# Altium PCB PCB1.PcbDoc (part 1 of 3)
Units mm, origin at the board's own origin, x right, y up, seen from the top; angles counter-clockwise.
Board outline 131 x 74 mm, 6 copper layers (Top Layer, Rele, Signals, +5V, GND, Bottom Layer), stack 1.732 mm thick; 176 components, 158 nets, 639 pads, 196 vias.
Unrouted connection lines stored in the file: 8.
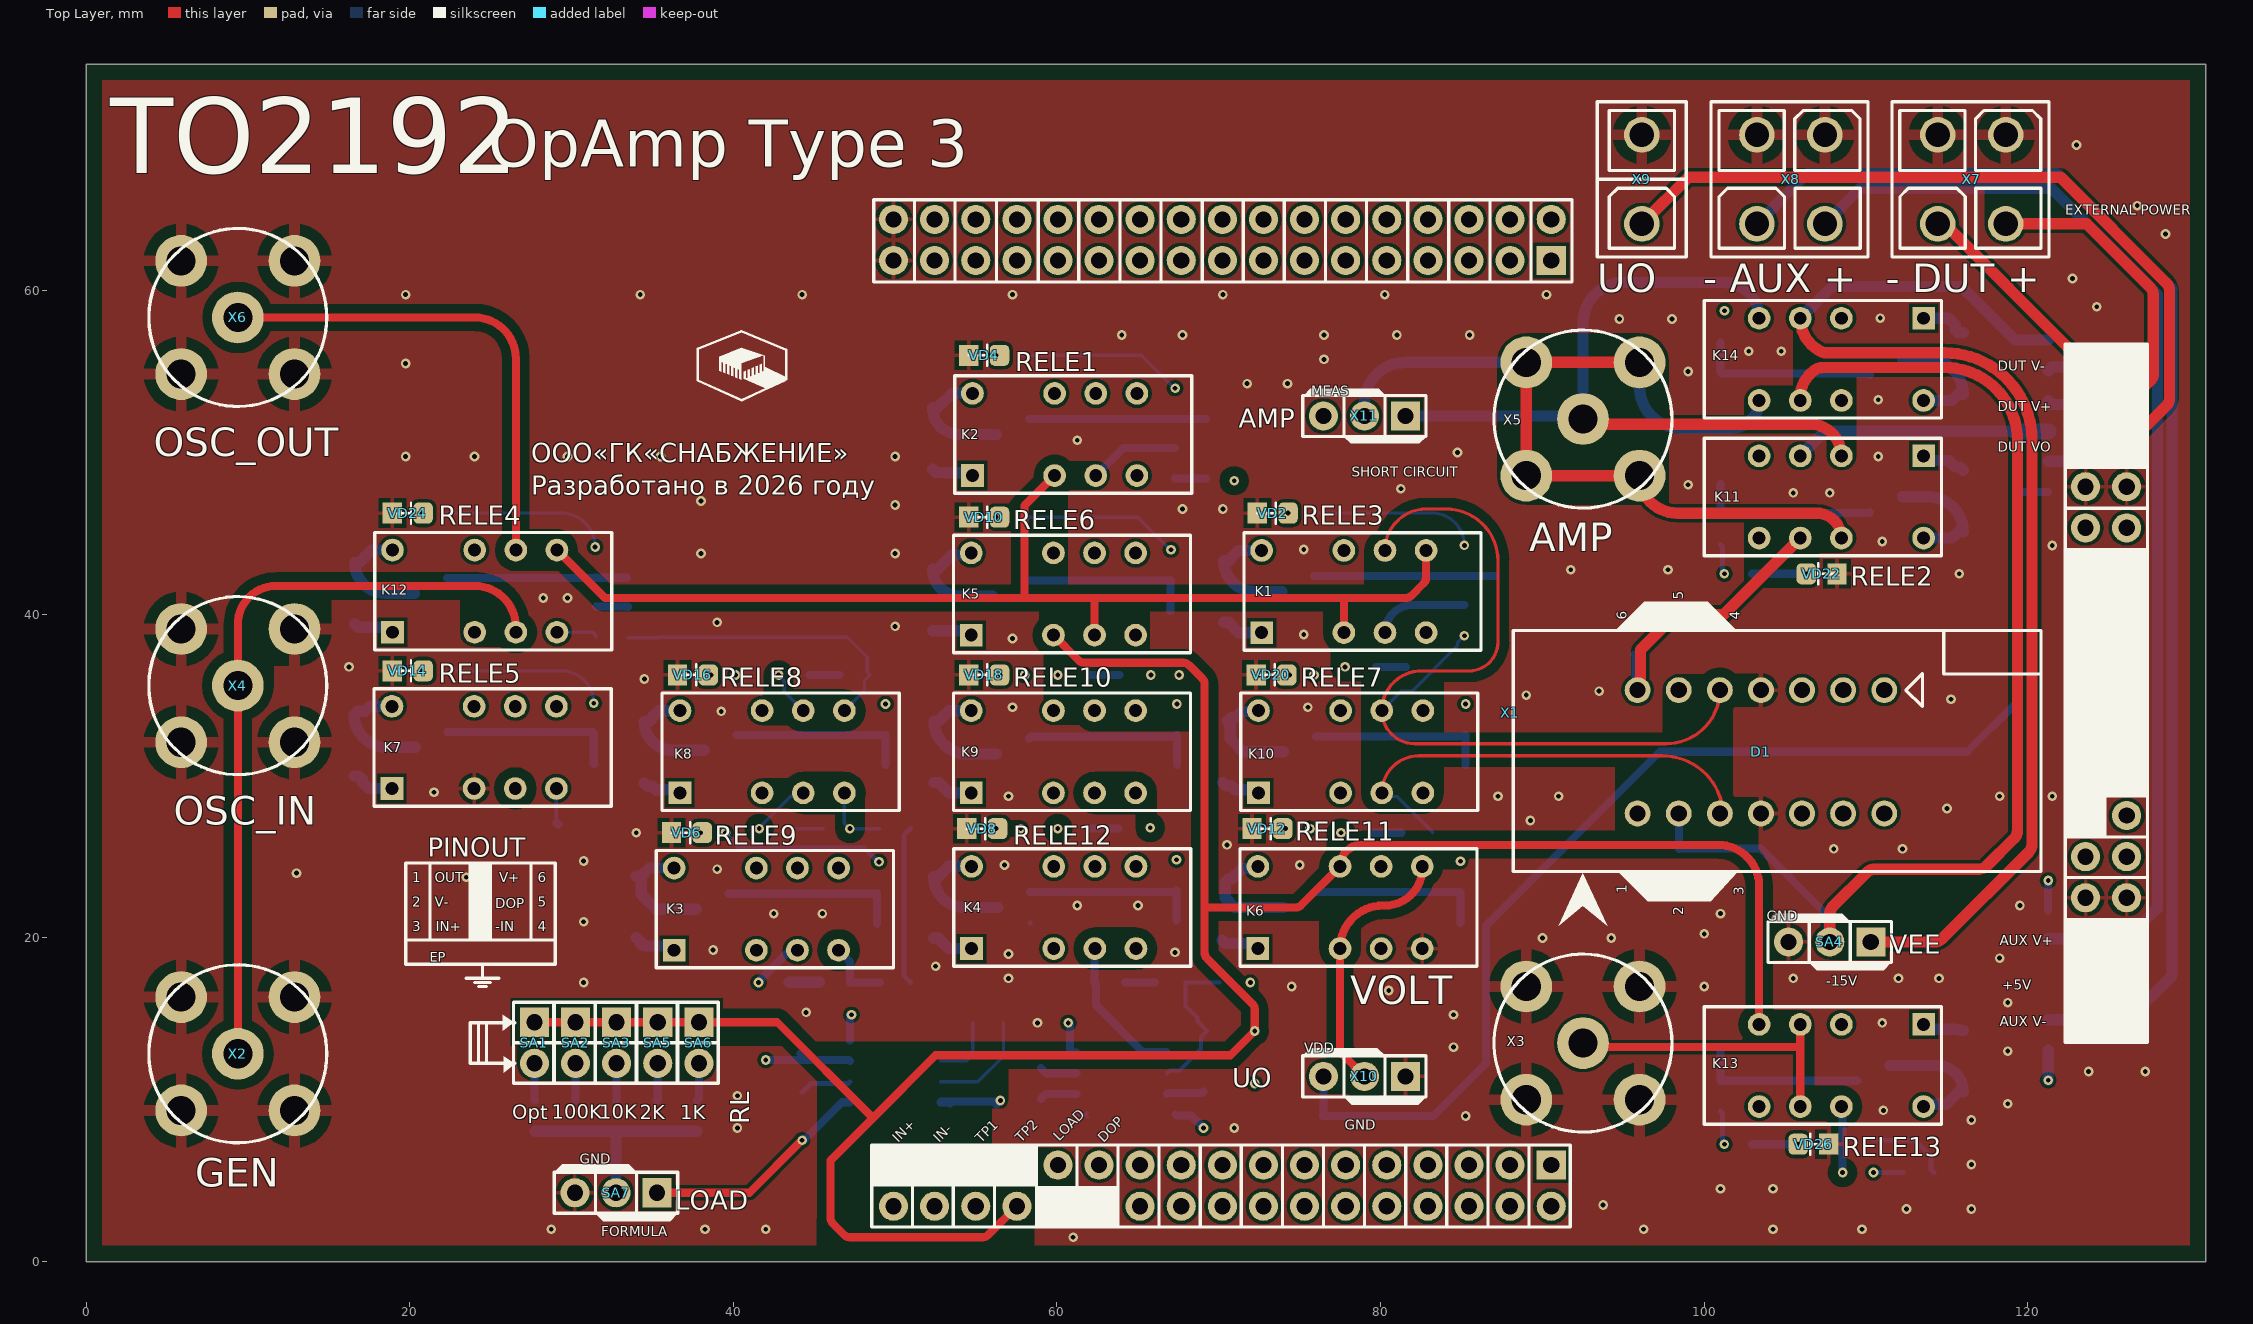
[diagram p0: Top Layer view]
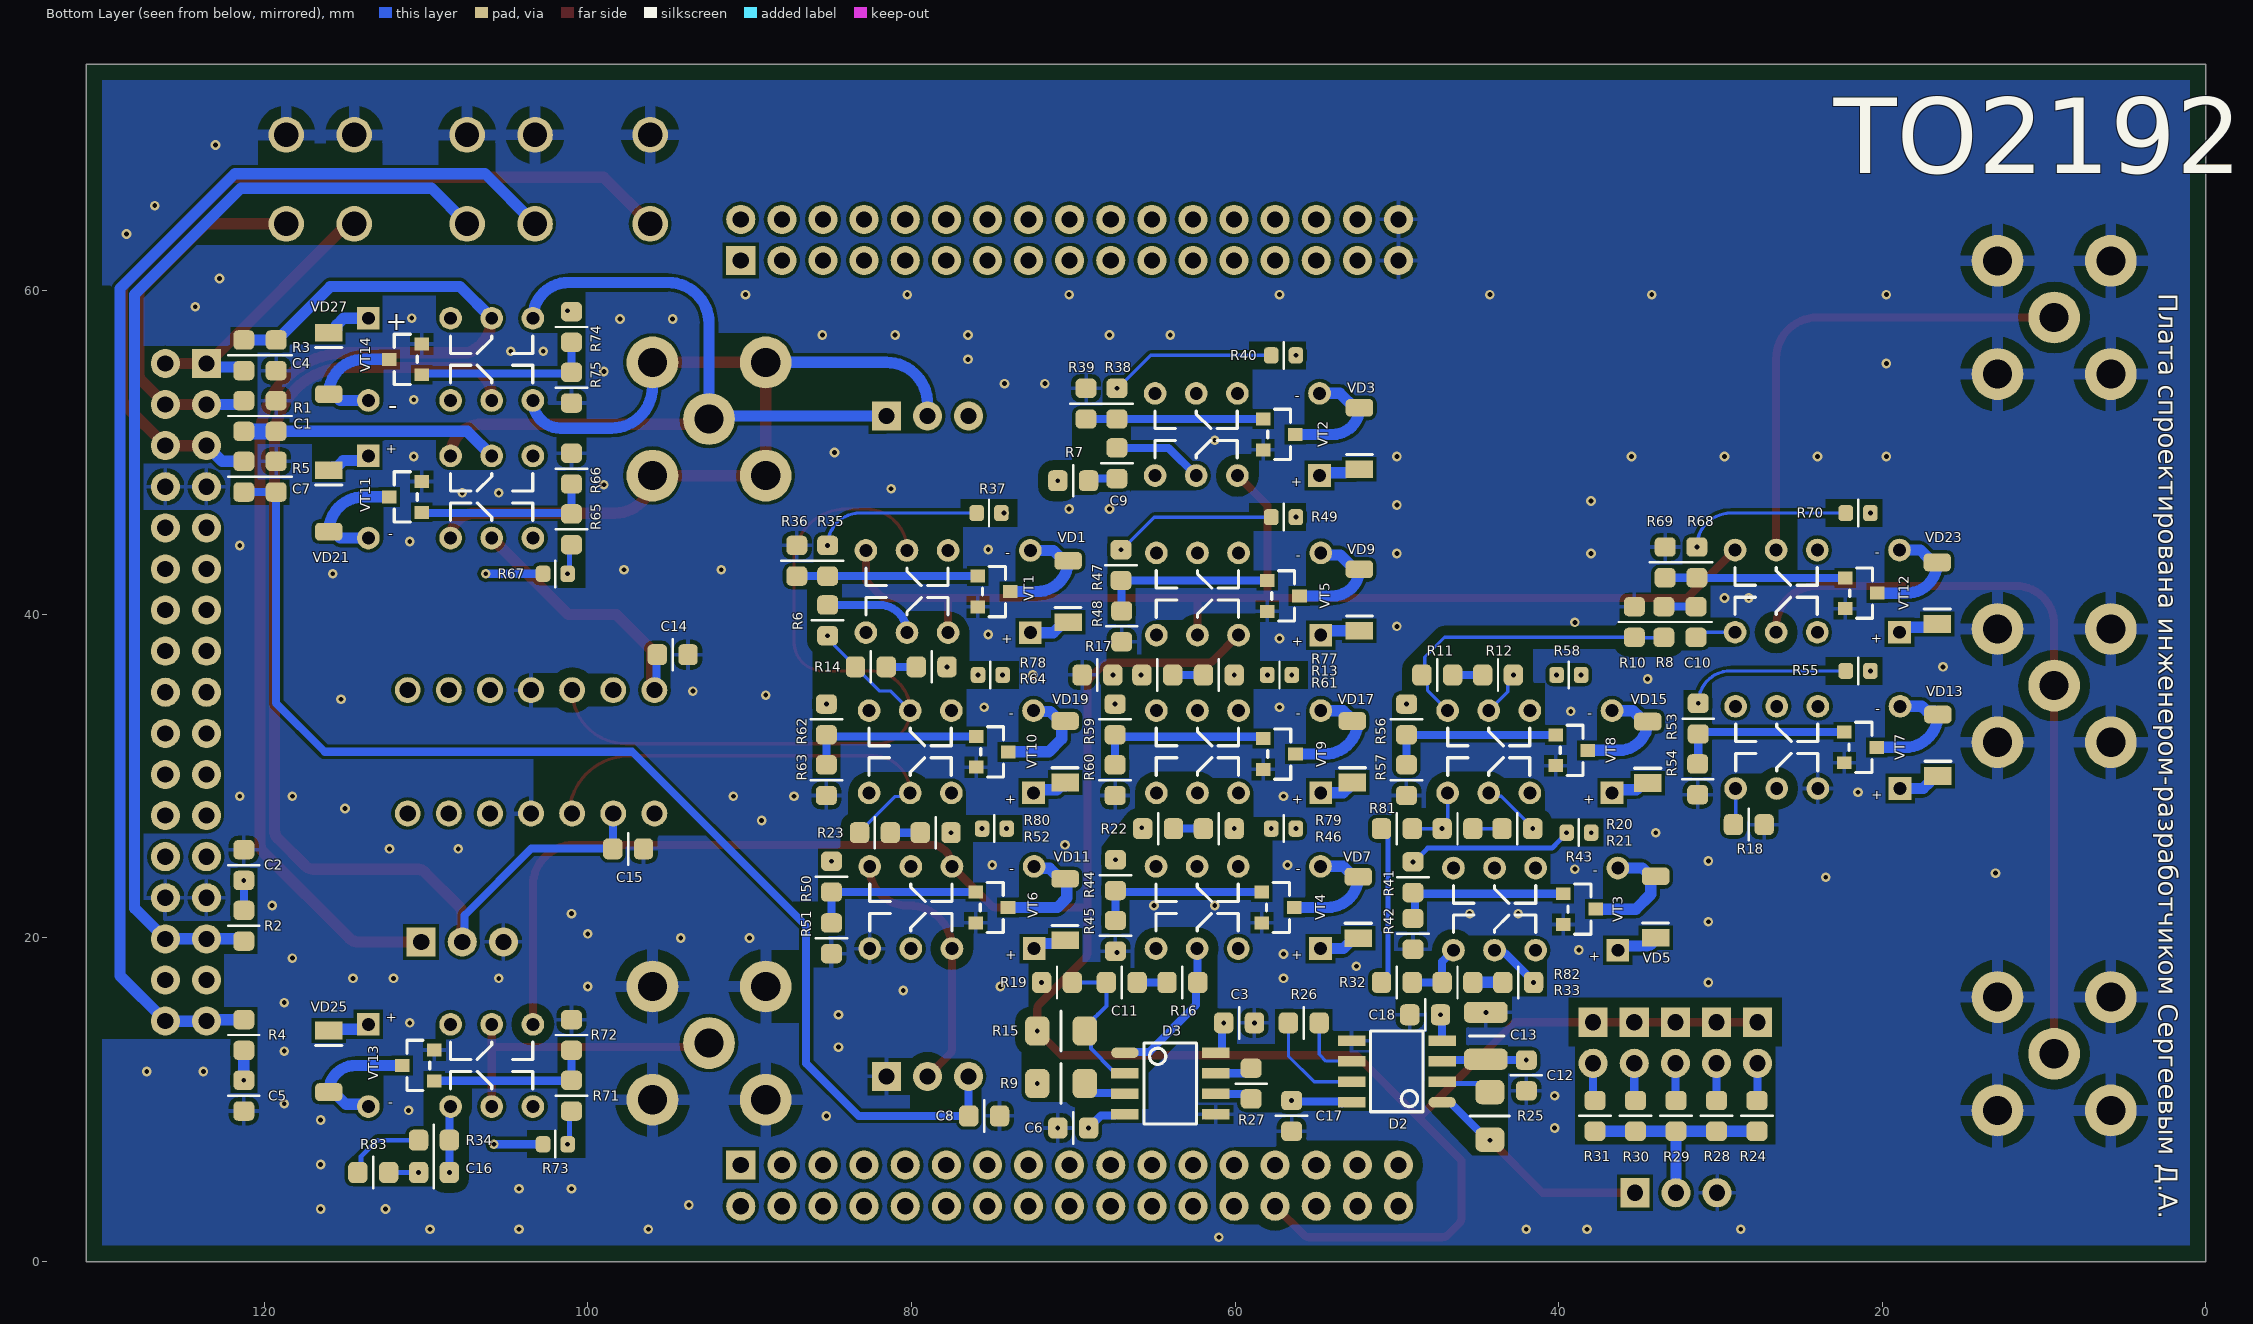
[diagram p1: Bottom Layer view, seen from below]
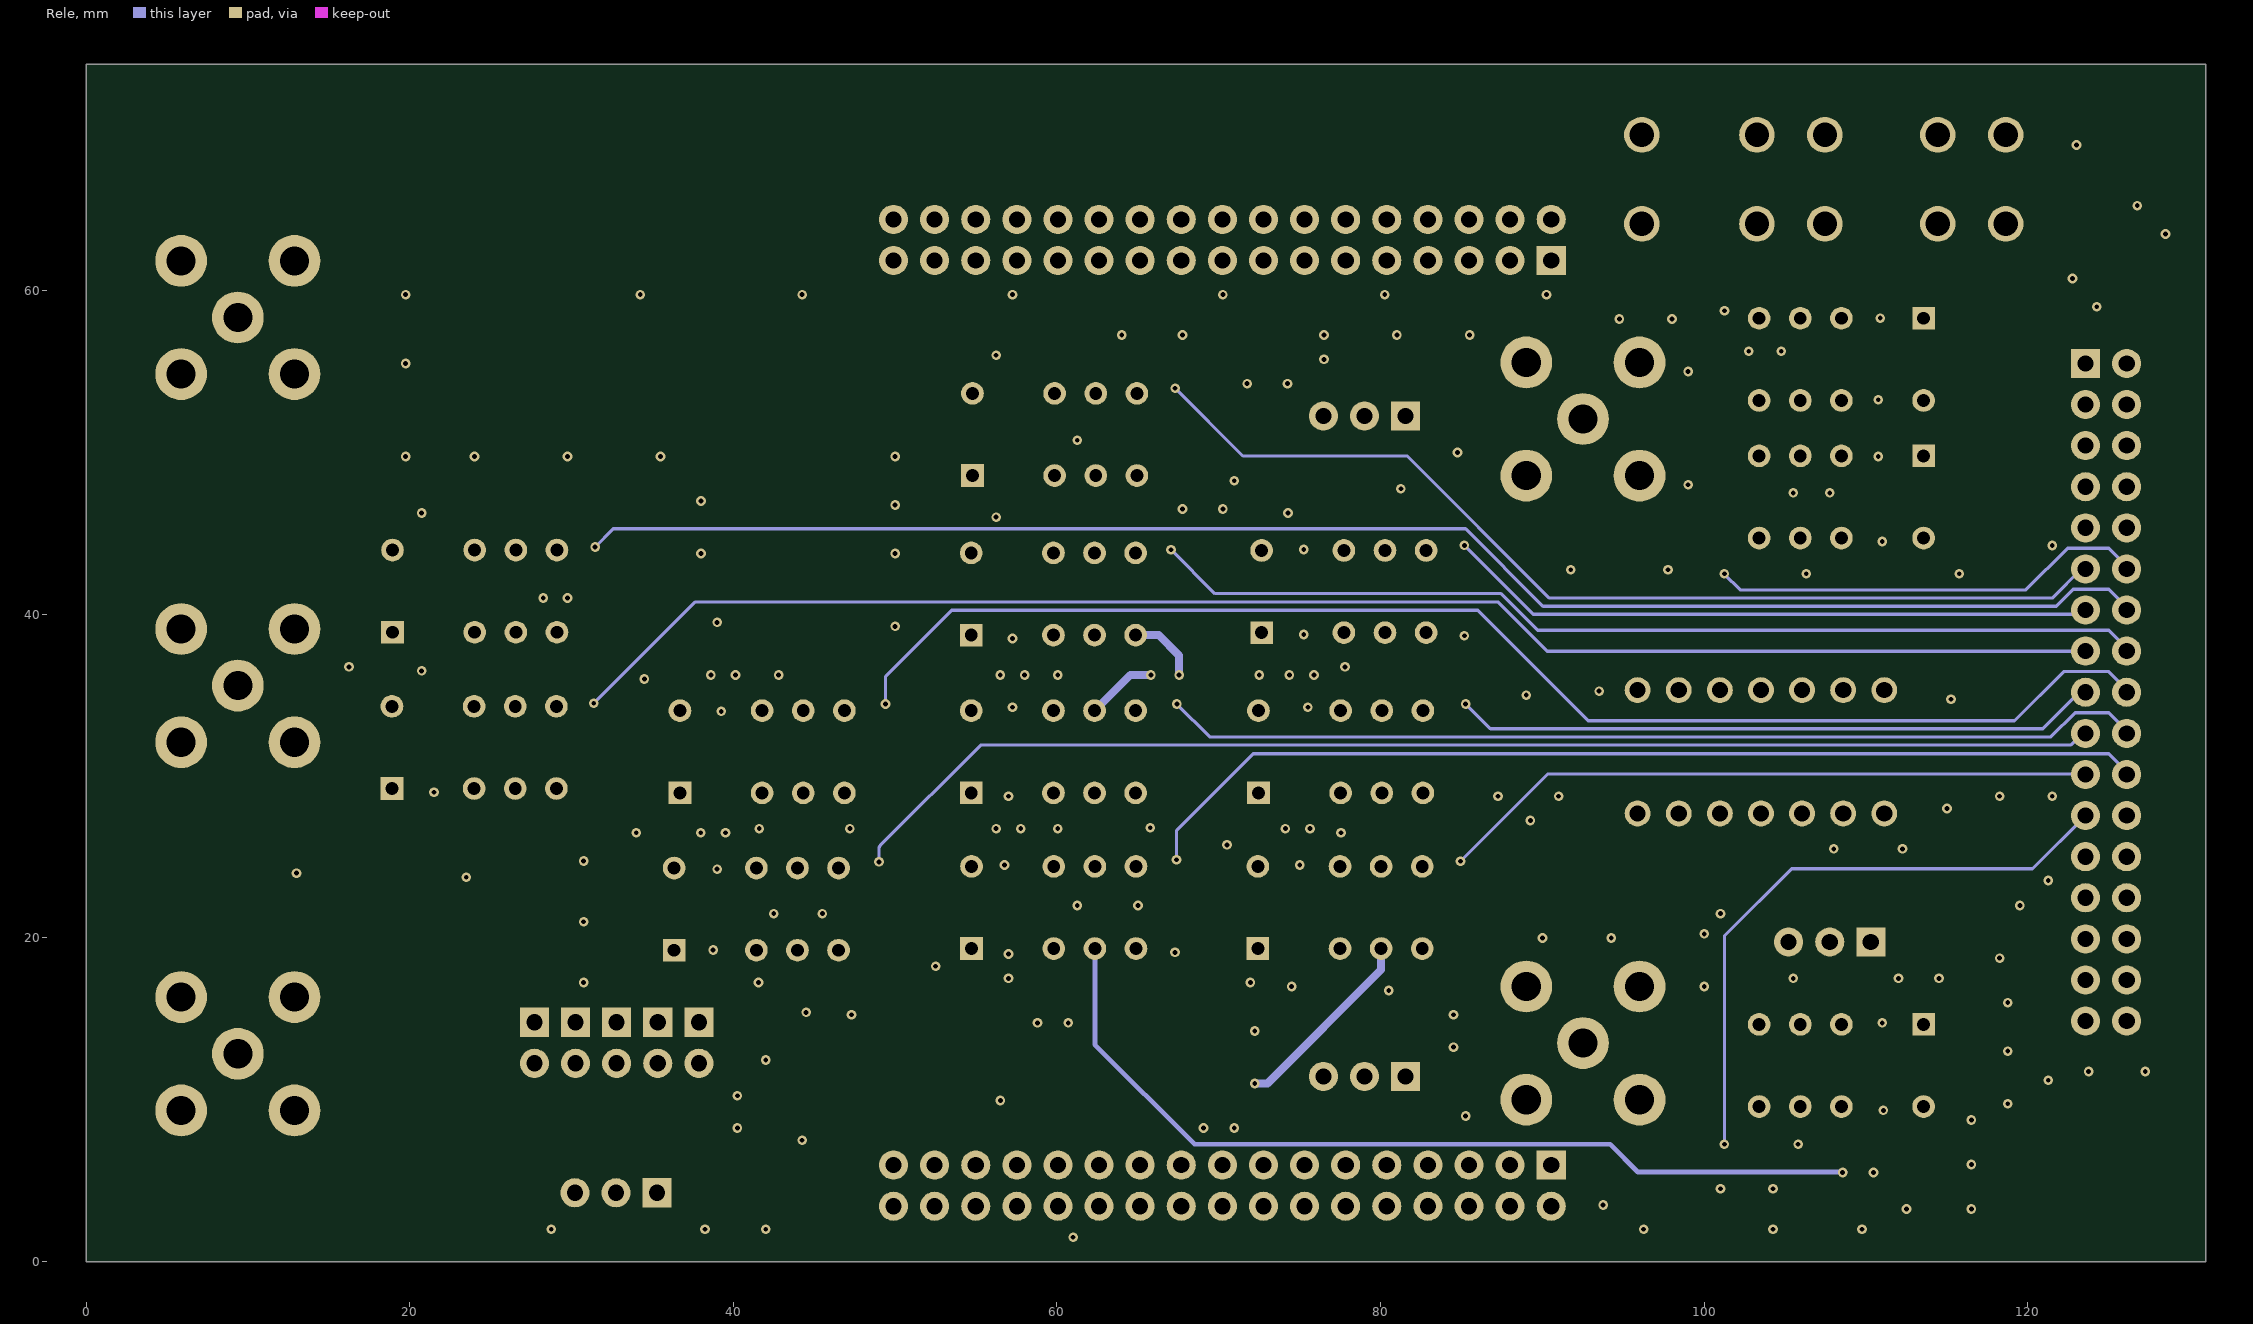
[diagram p2: Rele]
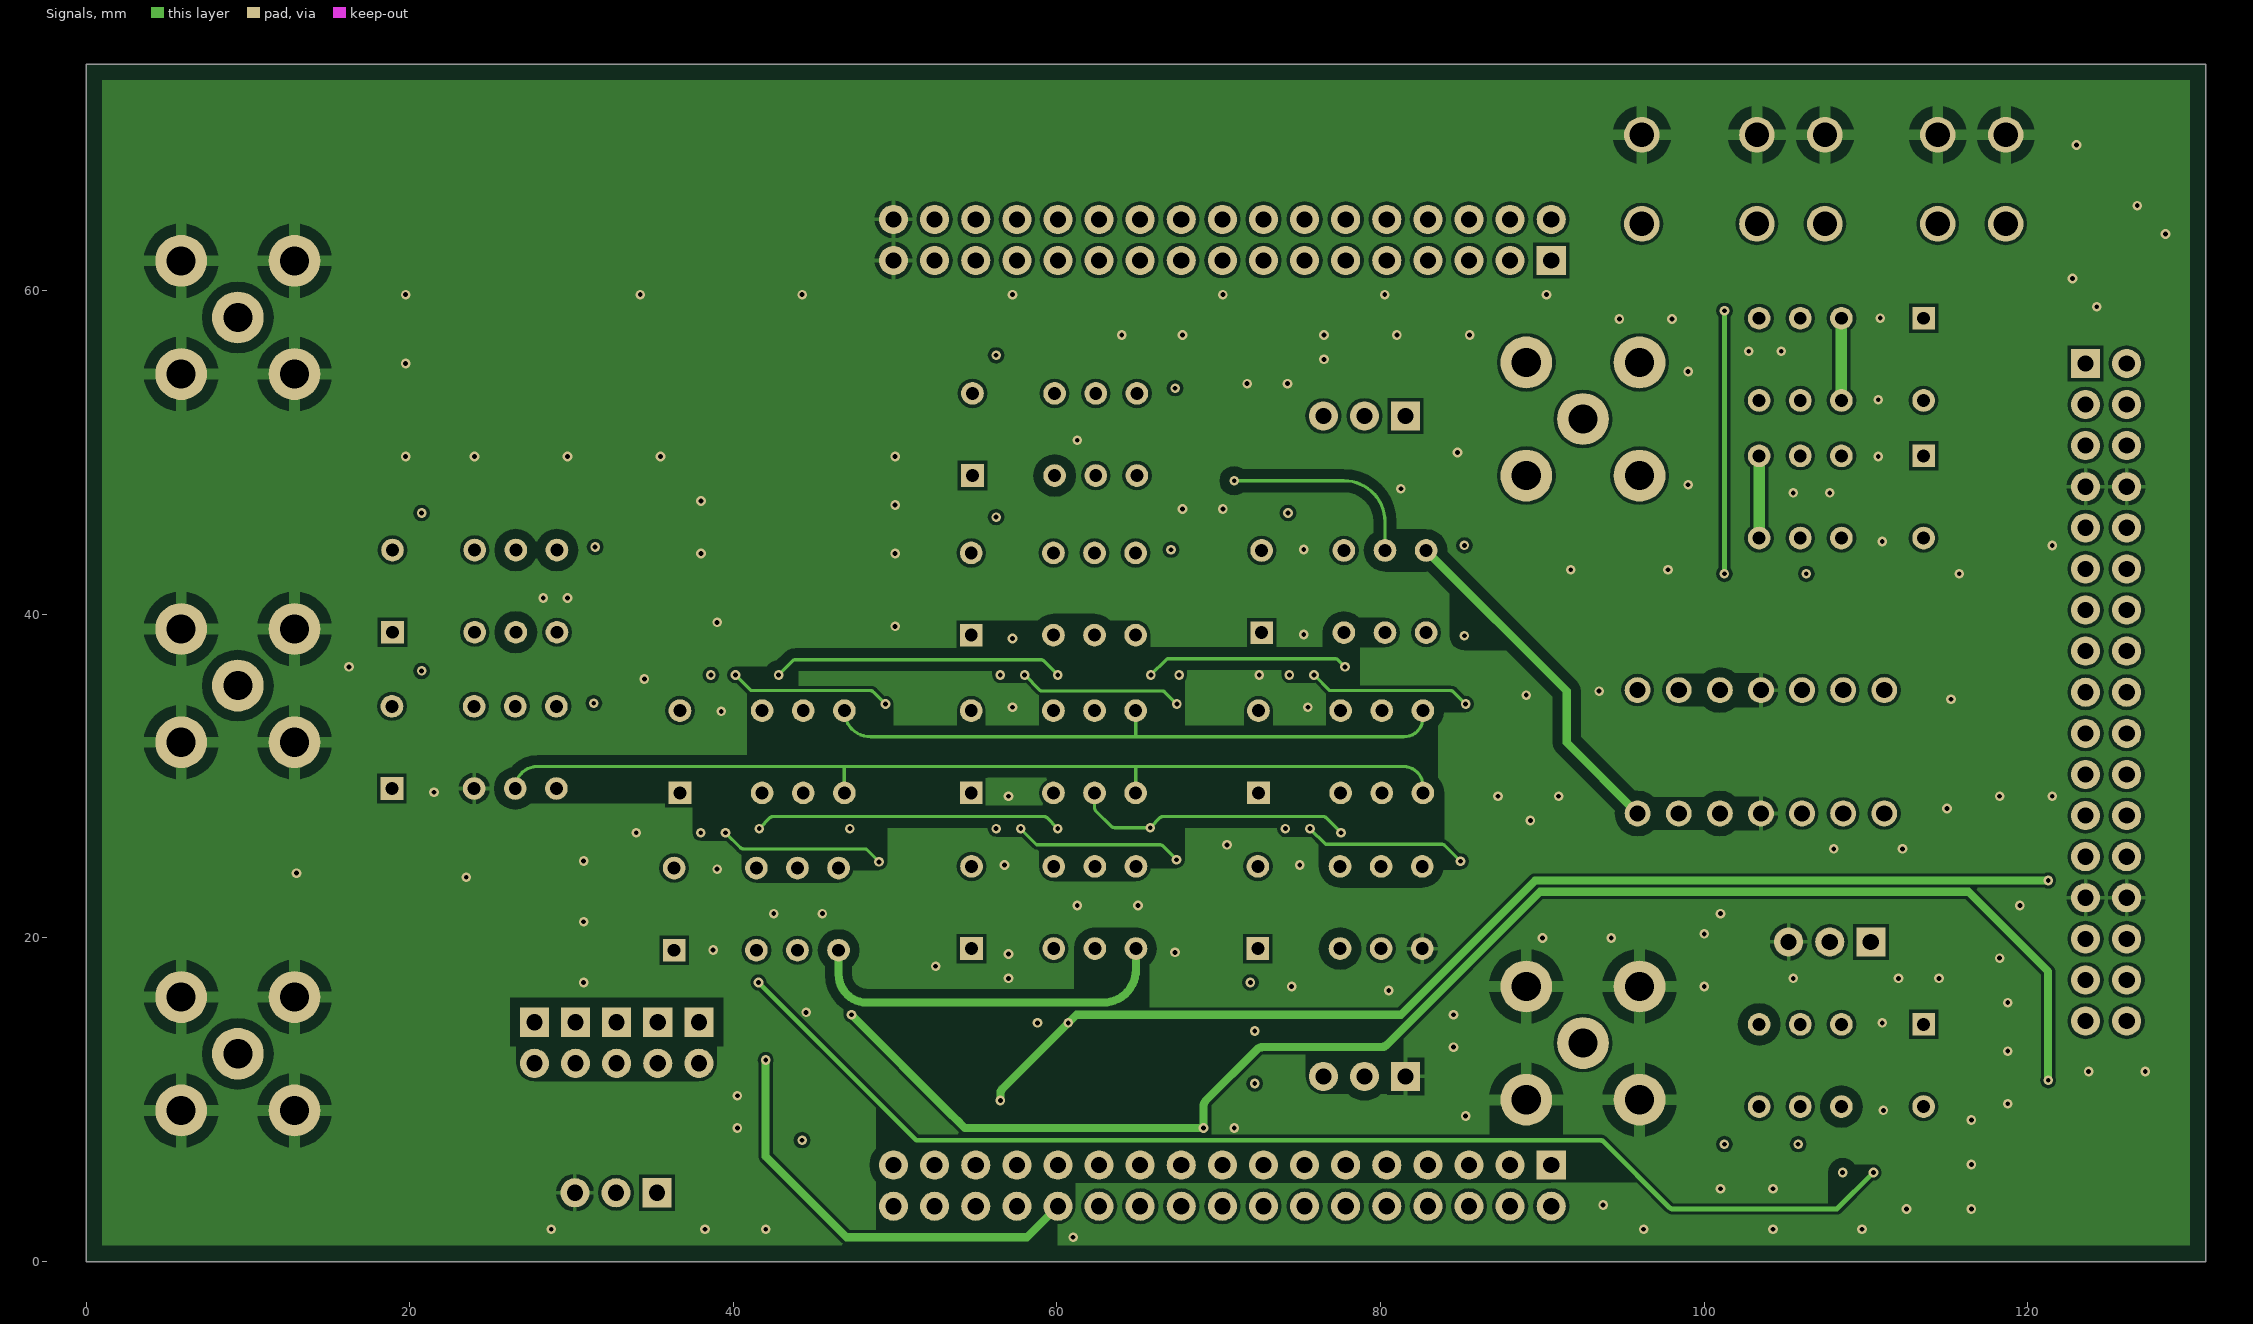
[diagram p3: Signals]
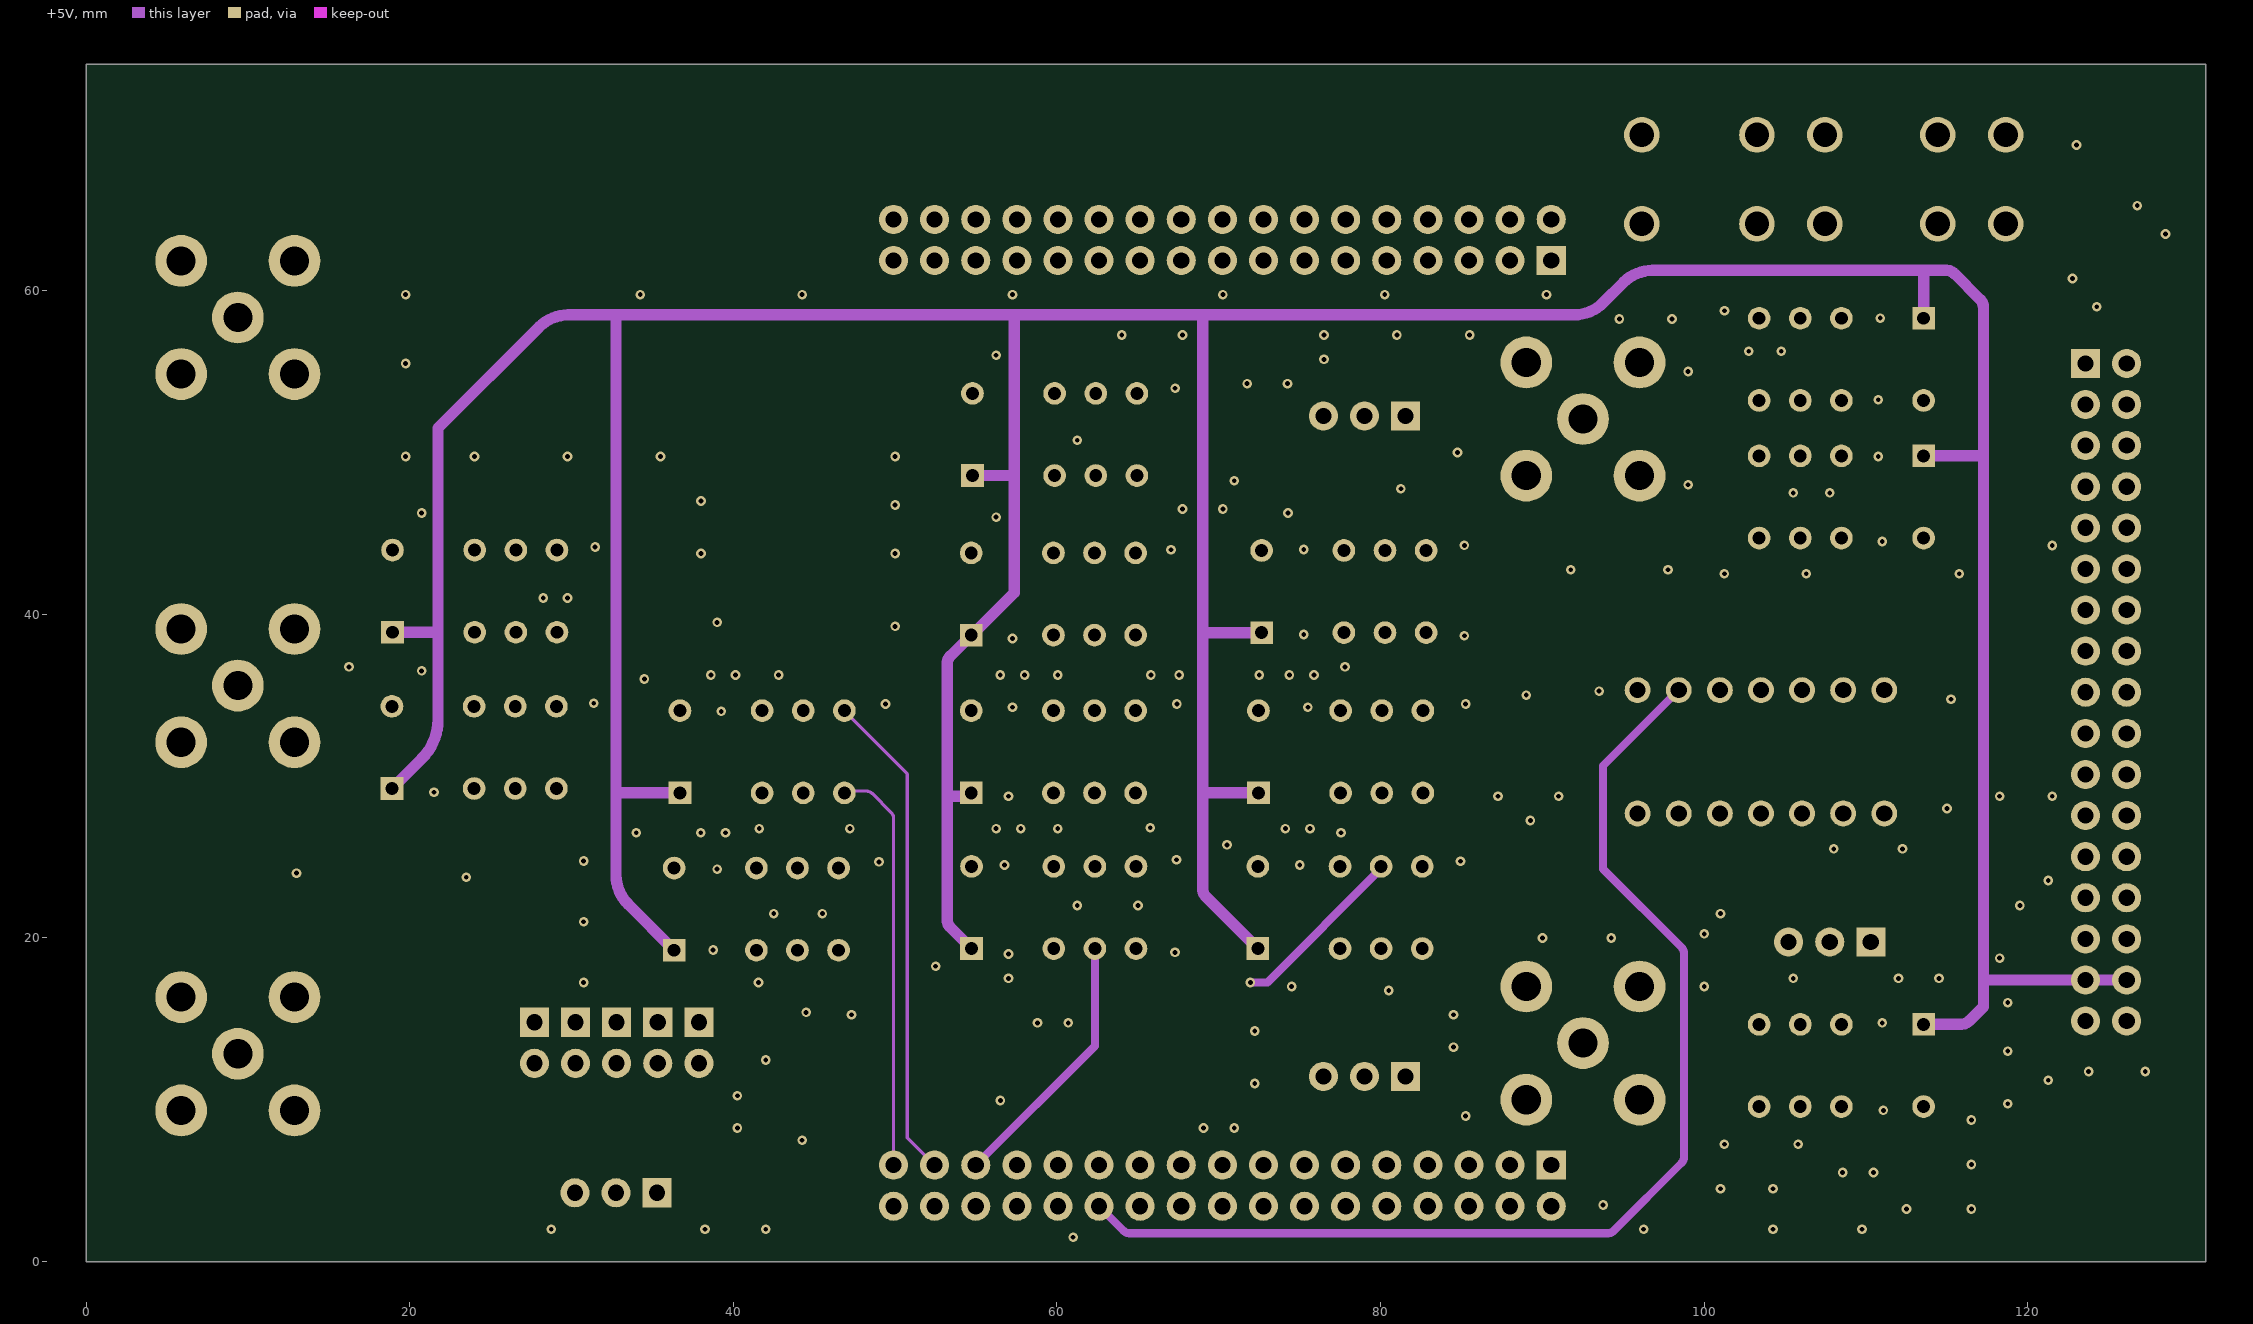
[diagram p4: +5V]
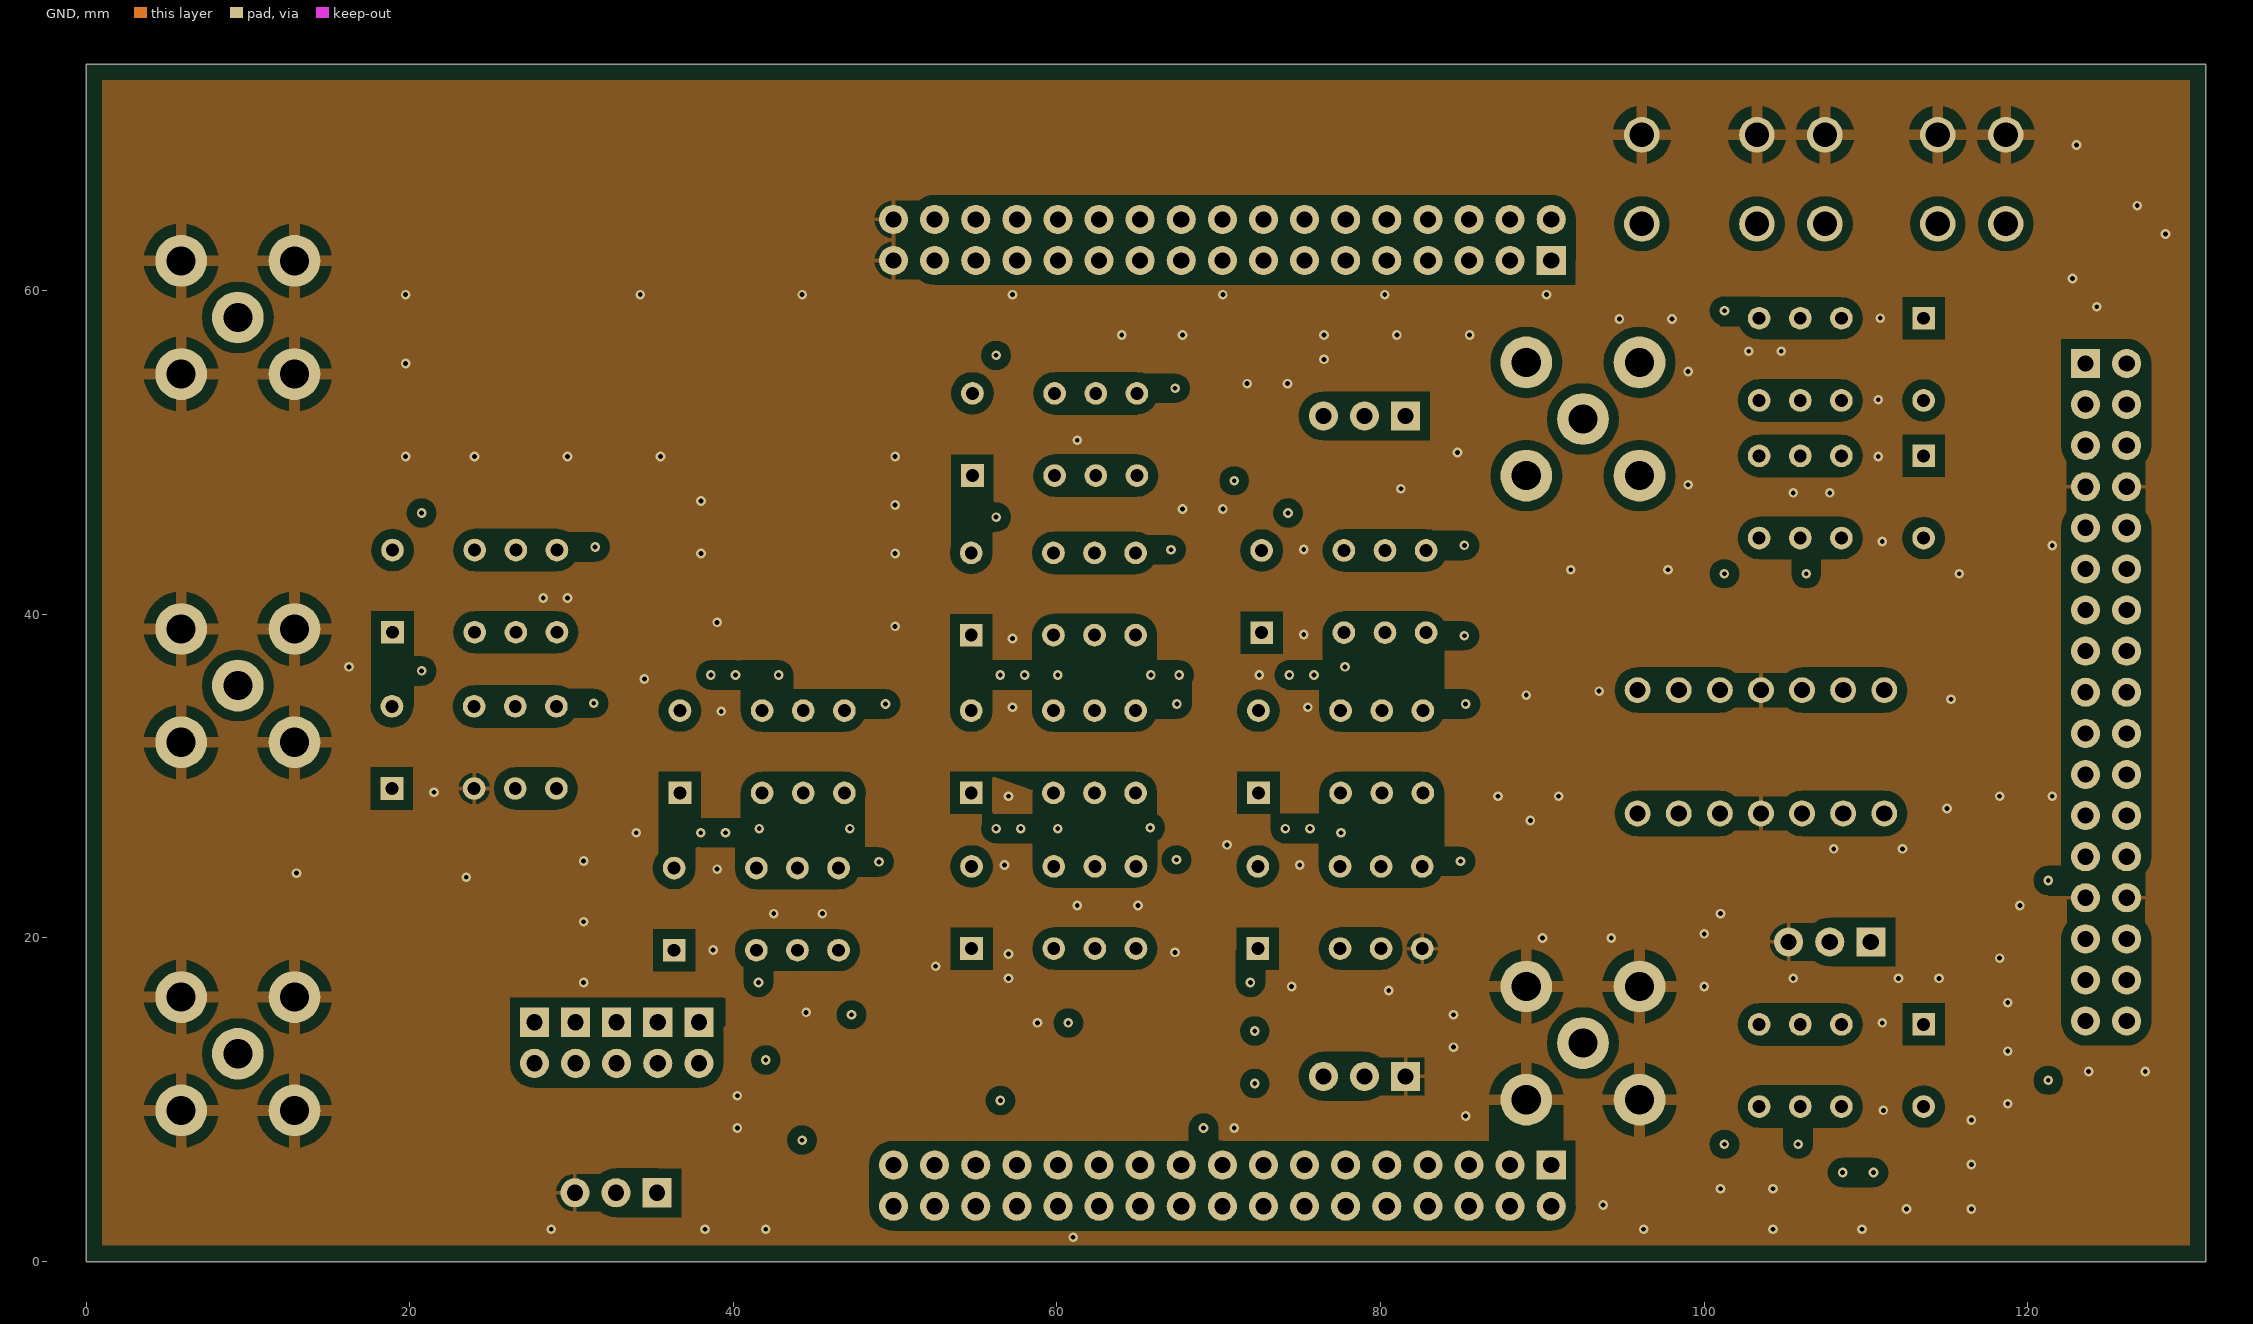
[diagram p5: GND]

## Layer stack, top to bottom
Top Solder: solder mask 0.0254, SM-001, Dk 4
Top Layer: signal copper 0.018
Dielectric 4: prepreg 0.115, FR4 PR, Dk 4.2
Rele: signal copper 0.018
Dielectric 2: prepreg 0.115, FR4 PR, Dk 4.2
Signals: signal copper 0.018
Dielectric 1: core 1.164, FR4 Tg150, Dk 4.6
+5V: signal copper 0.018
Dielectric 3: prepreg 0.115, FR4 PR, Dk 4.2
GND: signal copper 0.018
Dielectric 5: prepreg 0.115, FR4 PR, Dk 4.2
Bottom Layer: signal copper 0.018
Bottom Solder: solder mask 0.0254, SM-001, Dk 4

## Board outline
0,0 131,0 131,74 0,74

## Design rules (kind name [scope] priority, off if disabled: settings)
Clearance [OnLayer('GND')] p1: gap=0.2 ignorepadtopadclearanceinfootprint=FALSE except(0: Arc-Hole Track-Hole SMDPad-Hole THPad-Hole Via-Hole Fill-Hole Poly-Hole Region-Hole Text-Hole; 0.6: SMDPad-Poly THPad-Poly Via-Poly)
Clearance Clearance_OpAmp [(InNet('IN+') OR InNet('IN-') OR InNet('OUT') OR InNet('INPUT+') OR InNet('INPUT-') OR InNet('NetK8_9') OR InNet('NetK9_9') OR InNet('DUT_OUT') OR InNet('AUX_IN+') OR InNet('AUX_IN-') OR InNet('TP2') OR InNet('NetC14_2') OR InNet('AUX_OUT') OR InNet('NetK6_3') OR InNet('NetK9_4') OR InNet('NetK8_4') OR InNet('GEN') OR InNet('OSC'))] p2: gap=0.2 ignorepadtopadclearanceinfootprint=FALSE except(0: Arc-Hole Track-Hole SMDPad-Hole THPad-Hole Via-Hole Fill-Hole Poly-Hole Region-Hole Text-Hole; 0.6: Arc-Poly Track-Poly SMDPad-Poly THPad-Poly Via-Poly Fill-Poly Poly-Poly)
Clearance Clearance_default [All] p3: gap=0.2 ignorepadtopadclearanceinfootprint=FALSE except(0: Arc-Hole Track-Hole SMDPad-Hole THPad-Hole Via-Hole Fill-Hole Poly-Hole Region-Hole Text-Hole)
ComponentClearance [All] p1: gap=0 collisioncheckmode=3 verticalgap=0 showdistances=FALSE
MinimumSolderMaskSliver [All] p1: minsoldermaskwidth=0.1
PolygonConnect PolygonConnect_BNC [HasFootprint('BNC-7038') OR HasFootprint('DS1073-01-2x2-MVT6 (4 pin)') OR HasFootprint('DS1073-01-2x1-MVT6 (2 pin) - duplicate')] p1: connectstyle=Relief reliefconductorwidth=0.7 reliefentries=4 polygonreliefangle="90 Angle" airgapwidth=0.7
PolygonConnect [All] p2: thpad.connectstyle=Relief thpad.reliefconductorwidth=0.254 thpad.reliefentries=4 thpad.polygonreliefangle="90 Angle" thpad.airgapwidth=0.254 smdpad.connectstyle=Relief smdpad.reliefconductorwidth=0.254 smdpad.reliefentries=4 smdpad.polygonreliefangle="90 Angle" smdpad.airgapwidth=0.254 via.connectstyle=Direct via.reliefconductorwidth=0.254 via.reliefentries=4 via.polygonreliefangle="90 Angle" via.airgapwidth=0.254
RoutingVias [All] p1: holewidth=0.3 width=0.6 viastyle="Through Hole" minholewidth=0.3 minwidth=0.6 maxholewidth=1.2 maxwidth=2.4
SilkToSilkClearance [All] p1: silktosilkclearance=0
SilkToSolderMaskClearance [IsPad] p1: minsilkscreentomaskgap=0 clearancetoexposedcopper=TRUE
SolderMaskExpansion [All] p1: expansion=0.102 istentingtop=FALSE
Width [All] p1: maxlimit=1.2 minlimit=0.125 preferedwidth=0.3
26 further rules are at their usual default settings.

## Classes and differential pairs
component class RELE1: K14 R23 R69 VD16 VT2
channel class RELE_BLOCK: RELE3 RELE7 RELE10 RELE11 RELE13 "RELE 1" "RELE 11"
component class RELE13: K2 R8 R23 R61 VD20 VD26 VT2
component class "RELE 1": K2 R8 R11 R70 VD12 VD19 VT2
component class RELE12: K13 R9 R64 R68 VD16 VD24 VT6
component class RELE11: K10 R17 R25 R79 VD10 VD18 VT10
component class RELE10: K6 R16 R27 R51 VD20 VD25 VT9
component class RELE9: K4 R57 R67 VD7 VD24 VT11
component class RELE8: K13 R55 R76 R77 VD16 VD19 VT13
component class RELE7: K6 R22 R65 R74 VD20 VD22 VT13
component class RELE6: K6 R51 R59 R67 VD6 VD22 VT10
component class RELE5: K7 R22 R39 R40 VD24 VD25 VT13
component class RELE4: K3 R59 R67 R68 VD25 VD26 VT2
component class RELE3: K4 R34 R40 R52 VD7 VD26 VT11
component class RELE2: K13 R27 R79 VD19 VD20 VT6
component class MEAS_SCHEME: C3 C11 C12 C14 C15 C16 D2 R11 R17 R23 R25 R32 R33 R39 R40 R46 R47 R53 R55 R60 R61 R64 R65 R66 R67 R68 R69 R70 R74 R76 R79 R80 SA1 SA2 SA5 SA6 X6 X8
component class Main: D1 X2 X4 X8 X9 X10 X11
component class "FORMULA + POWER": C2 C3 C4 C12 C14 C15 C16 R2 R3 R4 X4

## Components (designator, comment, footprint, x,y, rotation, side; value= is the part's Value field where it differs from the comment)
C1 "10uF" 0805 119.25,52.25 r90 bottom
C2 "10uF" 0805 121.25,24.5 r90 bottom
C3 "0.1uF" 0805 59.75,14.75 r180 bottom
C4 "10uF" 0805 119.25,56 r270 bottom (schematic designator C5)
C5 "10uF" 0805 121.25,10.25 r270 bottom (schematic designator C6)
C6 "0.1uF" 0805 70,8.25 r0 bottom (schematic designator C7)
C7 "10uF" 0805 119.25,48.5 r90 bottom (schematic designator C9)
C8 "0.1uF" 0805 75.5,9 r180 bottom (schematic designator C10)
C9 "100nF" 0805 67.299,49.332 r270 bottom (schematic designator C11)
C10 "1nF" 0805 31.512,39.522 r270 bottom (schematic designator C12)
C11 "100nF" 0805 67,17.25 r180 bottom (schematic designator C13)
C12 "DNP" 0805 42,11.5 r270 bottom (schematic designator C14)
C13 "100nF" 1210 44.5,12.5 r0 bottom (schematic designator C15)
C14 "0.1uF" 0805 94.75,37.5 r180 bottom (schematic designator C16)
C15 "0.1uF" 0805 97.5,25.5 r180 bottom (schematic designator C17)
C16 "10nF" 0805 109.5,5.5 r0 bottom (schematic designator C18)
C17 "0.1uF" 0805 56.5,9 r270 bottom (schematic designator C4)
C18 "0.1uF" 0805 48.25,15.25 r0 bottom (schematic designator C8)
D1 "DUT OpAmpType3" "DIP 14" 103.5,31.5 r270 top
D2 "LM358" SOIC-8(R-8) 50,11.75 r0 bottom
D3 "AD706" SOIC-8(R-8) 64,11 r180 bottom
K1 "V23079A1001B301 TE" V23079A1001B301 78.949,41.402 r0 top
K2 "V23079A1001B301 TE" V23079A1001B301 61.076,51.11 r0 top (schematic designator K1)
K3 "V23079A1001B301 TE" V23079A1001B301 42.643,21.778 r0 top (schematic designator K1)
K4 "V23079A1001B301 TE" V23079A1001B301 61.02,21.88 r0 top (schematic designator K1)
K5 "V23079A1001B301 TE" V23079A1001B301 61,41.25 r0 top (schematic designator K1)
K6 "V23079A1001B301 TE" V23079A1001B301 78.71,21.88 r0 top (schematic designator K1)
K7 "V23079A1001B301 TE" V23079A1001B301 25.203,31.772 r0 top (schematic designator K1)
K8 "V23079A1001B301 TE" V23079A1001B301 43,31.5 r0 top (schematic designator K1)
K9 "V23079A1001B301 TE" V23079A1001B301 61,31.5 r0 top (schematic designator K1)
K10 "V23079A1001B301 TE" V23079A1001B301 78.75,31.5 r0 top locked (schematic designator K1)
K11 "V23079A1001B301 TE" V23079A1001B301 107.25,47.25 r180 top (schematic designator K1)
K12 "V23079A1001B301 TE" V23079A1001B301 25.239,41.427 r0 top locked (schematic designator K1)
K13 "V23079A1001B301 TE" V23079A1001B301 107.25,12.12 r180 top (schematic designator K1)
K14 "V23079A1001B301 TE" V23079A1001B301 107.25,55.75 r180 top (schematic designator K1)
R1 "0" 0805 121.25,52.25 r270 bottom
R2 "0" 0805 121.25,20.75 r270 bottom
R3 "0" 0805 121.25,56 r270 bottom
R4 "0" 0805 121.25,14 r90 bottom
R5 "0" 0805 121.25,48.5 r90 bottom
R6 "20k" 0805 85.172,39.624 r270 bottom (schematic designator R9)
R7 "20k" 0805 70,48.25 r0 bottom (schematic designator R10)
R8 "999K" 0805 33.5,39.522 r90 bottom (schematic designator R11)
R9 "0" 1206 70.75,11 r180 bottom (schematic designator R12)
R10 "49.9" 0805 35.322,39.522 r90 bottom (schematic designator R13)
R11 "20k" 0805 47.5,36.25 r0 bottom (schematic designator R14)
R12 "0" 0805 43.75,36.25 r0 bottom (schematic designator R15)
R13 "0" 0805 64.8,36.25 r180 bottom (schematic designator R16)
R14 "0" 0805 82.5,36.75 r180 bottom (schematic designator R17)
R15 "220K" 1206 70.75,14.25 r180 bottom (schematic designator R18)
R16 "1K" 0805 63.25,17.25 r180 bottom (schematic designator R19)
R17 "20k" 0805 68.5,36.25 r180 bottom (schematic designator R20)
R18 "49.9" 0805 28.25,27 r180 bottom (schematic designator R21)
R19 "220k" 0805 71,17.25 r180 bottom (schematic designator R22)
R20 "20k" 0805 46.25,26.75 r0 bottom (schematic designator R23)
R21 "0" 0805 42.55,26.75 r0 bottom (schematic designator R24)
R22 "0" 0805 64.75,26.75 r180 bottom (schematic designator R25)
R23 "0" 0805 82.25,26.5 r180 bottom (schematic designator R26)
R24 "DNP" 0805 27.75,9 r270 bottom (schematic designator R27)
R25 "1K" 1206 44.25,9 r90 bottom (schematic designator R30)
R26 "1K" 0805 55.75,14.75 r0 bottom (schematic designator R29)
R27 "1K" 0805 59,11 r90 bottom (schematic designator R28)
R28 "100k" 0805 30.25,9 r270 bottom (schematic designator R31)
R29 "10k" 0805 32.75,9 r270 bottom (schematic designator R32)
R30 "2k" 0805 35.25,9 r270 bottom (schematic designator R33)
R31 "1k" 0805 37.75,9 r270 bottom (schematic designator R34)
R32 "4.99K" 0805 50,17.25 r0 bottom (schematic designator R35)
R33 "49.9K" 0805 42.5,17.25 r0 bottom (schematic designator R36)
R34 "499K" 0805 109.5,7.5 r0 bottom (schematic designator R37)
R35 "4.7k" 0805 85.172,43.307 r270 bottom (schematic designator R6)
R36 "20k" 0805 87.077,43.307 r90 bottom (schematic designator R7)
R37 "2.2k" 0603 75.2,46.25 r180 bottom (schematic designator R8)
R38 "4.7k" 0805 67.299,53.015 r270 bottom (schematic designator R6)
R39 "20k" 0805 69.204,53.015 r90 bottom (schematic designator R7)
R40 "2.2k" 0603 57,56 r180 bottom (schematic designator R8)
R41 "4.7k" 0805 49,23.75 r270 bottom (schematic designator R6)
R42 "20k" 0805 49,20.25 r270 bottom (schematic designator R7)
R43 "2.2k" 0603 38.75,26.5 r180 bottom (schematic designator R8)
R44 "4.7k" 0805 67.391,23.876 r270 bottom (schematic designator R6)
R45 "20k" 0805 67.391,20.126 r270 bottom (schematic designator R7)
R46 "2.2k" 0603 57,26.75 r180 bottom (schematic designator R8)
R47 "4.7k" 0805 67.049,43.036 r270 bottom (schematic designator R6)
R48 "20k" 0805 67,39.25 r270 bottom (schematic designator R7)
R49 "2.2k" 0603 57,46 r180 bottom (schematic designator R8)
R50 "4.7k" 0805 84.933,23.785 r270 bottom (schematic designator R6)
R51 "20k" 0805 84.933,19.975 r270 bottom (schematic designator R7)
R52 "2.2k" 0603 74.87,26.75 r180 bottom (schematic designator R8)
R53 "4.7k" 0805 31.376,33.55 r270 bottom (schematic designator R6)
R54 "20k" 0805 31.408,29.8 r270 bottom (schematic designator R7)
R55 "2.2k" 0603 21.5,36.5 r180 bottom (schematic designator R8)
R56 "4.7k" 0805 49.408,33.5 r270 bottom (schematic designator R6)
R57 "20k" 0805 49.408,29.75 r270 bottom (schematic designator R7)
R58 "2.2k" 0603 39.37,36.25 r180 bottom (schematic designator R8)
R59 "4.7k" 0805 67.408,33.5 r270 bottom (schematic designator R6)
R60 "20k" 0805 67.408,29.75 r270 bottom (schematic designator R7)
R61 "2.2k" 0603 57.25,36.25 r180 bottom (schematic designator R8)
R62 "4.7k" 0805 85.25,33.5 r270 bottom (schematic designator R6)
R63 "20k" 0805 85.25,29.75 r270 bottom (schematic designator R7)
R64 "2.2k" 0603 75.12,36.25 r180 bottom (schematic designator R8)
R65 "4.7k" 0805 101,45.25 r90 bottom (schematic designator R6)
R66 "20k" 0805 101,49 r90 bottom (schematic designator R7)
R67 "2.2k" 0603 102,42.5 r0 bottom (schematic designator R8)
R68 "4.7k" 0805 31.462,43.205 r270 bottom (schematic designator R6)
R69 "20k" 0805 33.417,43.205 r90 bottom (schematic designator R7)
R70 "2.2k" 0603 21.5,46.25 r180 bottom (schematic designator R8)
R71 "4.7k" 0805 101,10.25 r90 bottom (schematic designator R6)
R72 "20k" 0805 101,14 r90 bottom (schematic designator R7)
R73 "2.2k" 0603 102,7.25 r0 bottom (schematic designator R8)
R74 "4.7k" 0805 101,57.75 r270 bottom (schematic designator R6)
R75 "20k" 0805 101,54 r270 bottom (schematic designator R7)
R77 "499k" 0805 61,36.25 r180 bottom (schematic designator R38)
R78 "4.99M" 0805 78.75,36.75 r180 bottom (schematic designator R39)
R79 "499k" 0805 61,26.75 r180 bottom (schematic designator R40)
R80 "4.99M" 0805 78.5,26.5 r180 bottom (schematic designator R41)
R81 "0" 0805 50,26.75 r180 bottom (schematic designator R42)
R82 "0" 0805 46.25,17.25 r0 bottom (schematic designator R43)
R83 "0" 0805 113.25,5.5 r180 bottom (schematic designator R44)
SA1 "JUMPER_1" PLS2-2,54 27.71,13.52 r270 top
SA2 "JUMPER_1" PLS2-2,54 30.25,13.52 r270 top
SA3 "JUMPER_1" PLS2-2,54 32.79,13.52 r270 top
SA4 "JUMPER_2" PLS3-2,54 107.75,19.75 r180 top
SA5 "JUMPER_1" PLS2-2,54 35.33,13.52 r270 top
SA6 "JUMPER_1" PLS2-2,54 37.87,13.52 r270 top
SA7 "JUMPER_2" PLS3-2,54 32.75,4.25 r180 top
VD1 "LL4148 NXP" SOD80C 70.313,41.402 r270 bottom
VD2 "KP-1608" 0805(LED) 73.33,46.25 r180 top
VD3 "LL4148 NXP" SOD80C 52.313,50.856 r270 bottom (schematic designator VD1)
VD4 "KP-1608" 0805(LED) 55.5,56 r180 top (schematic designator VD2)
VD5 "LL4148 NXP" SOD80C 34.007,21.905 r270 bottom (schematic designator VD1)
VD6 "KP-1608" 0805(LED) 37.13,26.5 r180 top (schematic designator VD2)
VD7 "LL4148 NXP" SOD80C 52.384,21.88 r270 bottom (schematic designator VD1)
VD8 "KP-1608" 0805(LED) 55.38,26.75 r180 top (schematic designator VD2)
VD9 "LL4148 NXP" SOD80C 52.317,40.877 r270 bottom (schematic designator VD1)
VD10 "KP-1608" 0805(LED) 55.5,46 r180 top (schematic designator VD2)
VD11 "LL4148 NXP" SOD80C 70.5,21.75 r270 bottom (schematic designator VD1)
VD12 "KP-1608" 0805(LED) 73,26.75 r180 top (schematic designator VD2)
VD13 "LL4148 NXP" SOD80C 16.567,31.899 r270 bottom (schematic designator VD1)
VD14 "KP-1608" 0805(LED) 19.88,36.5 r180 top (schematic designator VD2)
VD15 "LL4148 NXP" SOD80C 34.492,31.463 r270 bottom (schematic designator VD1)
VD16 "KP-1608" 0805(LED) 37.5,36.25 r180 top (schematic designator VD2)
VD17 "LL4148 NXP" SOD80C 52.75,31.5 r270 bottom (schematic designator VD1)
VD18 "KP-1608" 0805(LED) 55.5,36.25 r180 top (schematic designator VD2)
VD19 "LL4148 NXP" SOD80C 70.5,31.5 r270 bottom (schematic designator VD1)
VD20 "KP-1608" 0805(LED) 73.25,36.25 r180 top (schematic designator VD2)
VD21 "LL4148 NXP" SOD80C 116,47 r90 bottom (schematic designator VD1)
VD22 "KP-1608" 0805(LED) 107.25,42.5 r0 top (schematic designator VD2)
VD23 "LL4148 NXP" SOD80C 16.603,41.3 r270 bottom (schematic designator VD1)
VD24 "KP-1608" 0805(LED) 19.88,46.25 r180 top (schematic designator VD2)
VD25 "LL4148 NXP" SOD80C 116,12.374 r90 bottom (schematic designator VD1)
VD26 "KP-1608" 0805(LED) 106.75,7.25 r0 top (schematic designator VD2)
VD27 "LL4148 NXP" SOD80C 116,55.5 r90 bottom (schematic designator VD1)
VT1 "MMBT5551L" SOT-23 74.885,41.402 r270 bottom
VT2 "MMBT5551L" SOT-23 57.266,51.11 r270 bottom (schematic designator VT1)
VT3 "MMBT5551L" SOT-23 38.706,21.778 r270 bottom (schematic designator VT1)
VT4 "MMBT5551L" SOT-23 57.337,21.88 r270 bottom (schematic designator VT1)
VT5 "MMBT5551L" SOT-23 57.016,41.131 r270 bottom (schematic designator VT1)
VT6 "MMBT5551L" SOT-23 75.027,21.88 r270 bottom (schematic designator VT1)
VT7 "MMBT5551L" SOT-23 21.343,31.772 r270 bottom (schematic designator VT1)
VT8 "MMBT5551L" SOT-23 39.191,31.59 r270 bottom (schematic designator VT1)
VT9 "MMBT5551L" SOT-23 57.26,31.36 r270 bottom (schematic designator VT1)
VT10 "MMBT5551L" SOT-23 75,31.5 r270 bottom (schematic designator VT1)
VT11 "MMBT5551L" SOT-23 111.25,47.25 r90 bottom (schematic designator VT1)
VT12 "MMBT5551L" SOT-23 21.302,41.3 r270 bottom (schematic designator VT1)
VT13 "MMBT5551L" SOT-23 110.47,12.12 r90 bottom (schematic designator VT1)
VT14 "MMBT5551L" SOT-23 111.25,55.75 r90 bottom (schematic designator VT1)
X1 "FORMULA" FORMULA 78.359,32.639 r0 top locked (schematic designator X9)
X2 "BNC-7038" BNC-7038 9.38,12.839 r0 top (schematic designator X1)
X3 "BNC-7038" BNC-7038 92.5,13.5 r0 top (schematic designator X2)
X4 "BNC-7038" BNC-7038 9.38,35.589 r0 top (schematic designator X3)
X5 "BNC-7038" BNC-7038 92.5,52.062 r0 top (schematic designator X4)
X6 "BNC-7038" BNC-7038 9.38,58.339 r0 top (schematic designator X5)
X7 "DS1073-01-2x2-MVT6 (4 pin)" "DS1073-01-2x2-MVT6 (4 pin)" 114.427,64.135 r0 top (schematic designator X6)
X8 "DS1073-01-2x2-MVT6 (4 pin)" "DS1073-01-2x2-MVT6 (4 pin)" 103.251,64.135 r0 top (schematic designator X7)
X9 "DS1073-01-2x1-MVT6 (2pin)_1" "DS1073-01-2x1-MVT6 (2 pin) - duplicate" 96.139,64.135 r0 top (schematic designator X8)
X10 "JUMPER1_V2" PLS3-2,54 79,11.443 r180 top
X11 "JUMPER1_V2" PLS3-2,54 79,52.25 r180 top

## Footprints (in the part's own frame and the unit in brackets; to place one, negate y for a bottom-side part, rotate by r counter-clockwise, add the part's x,y. Pads: shape width x height; smd on the part's side, far side on the other; paste and mask are expansions set on the pad)
0603 [mm]
  rrect50% 0.9x1 smd: 1(-0.76,0) 2(0.76,0)
  silkscreen extent 0,-0.82 0,0.82, body extent -0.8,-0.4 0.8,0.4, height 0.45
0805 [mm]
  rrect50% 1.2x1.3 smd: 1(-0.95,0) 2(0.95,0)
  silkscreen extent 0,-0.97 0,0.97, body extent -1.05,-0.63 0.95,0.63, height 0.55
0805(LED) [mm]
  rrect50% 1.2x1.3 smd: 1(-0.95,0)
  rect 1.2x1.3 smd: 2(0.95,0)
  silkscreen extent -0.2,-0.65 0.95,0.65, body extent -1.03,-0.41 1.03,0.5, height 0.85
1206 [mm]
  rrect50% 1.5x1.8 smd: 1(-1.47,0) 2(1.47,0)
  silkscreen extent 0,-1.22 0,1.22, body extent -1.81,-0.8 1.79,0.8, height 0.55
1210 [mm]
  rrect50% 2.7x1.3 smd: 1(0,0) 2(0,-2.9)
  silkscreen extent -1.12,-1.44 1,-1.44
BNC-7038 [mm]
  round 3.2 hole 1.8: 1(0,0) 2(-3.5,-3.5) 2(-3.5,3.5) 2(3.5,-3.5) 2(3.5,3.5)
  silkscreen extent -5.5,-5.5 5.5,5.5, body extent -3.97,-4.33 3.57,4.68, height 12
"DIP 14" [mm] "ZIF DIP"
  round 1.6 hole 1: 1(-3.81,7.62) 2(-3.81,5.08) 3(-3.81,2.54) 4(-3.81,0) 5(-3.81,-2.54) 6(-3.81,-5.08) 7(-3.81,-7.62) 8(3.81,-7.62) 9(3.81,-5.08) 10(3.81,-2.54) 11(3.81,0) 12(3.81,2.54) 13(3.81,5.08) 14(3.81,7.62)
  silkscreen extent -7.5,-15.3 7.4,17.3, body extent -8.6,-15.3 7.4,17.9, height 22.85
"DS1073-01-2x1-MVT6 (2 pin) - duplicate" [mm]
  round 2.2 hole 1.5: 1(0,-0.01) 2(0,5.49)
  silkscreen extent -2.75,-2.06 2.75,7.54
"DS1073-01-2x2-MVT6 (4 pin)" [mm]
  round 2.2 hole 1.5: 1(0,-0.01) 2(0,5.49) 3(4.2,-0.01) 4(4.2,5.49)
  silkscreen extent -2.83,-2.06 6.87,7.54
FORMULA [mm]
  rect 1.8x1.8 hole 1: 1(12.18,29.22) VDDF(12.18,-26.68) VEEF(45.2,22.86)
  round 1.8 hole 1: 2(9.64,29.22) 3(7.1,29.22) 4(4.56,29.22) 5(2.02,29.22) 6(-0.52,29.22) 7(-3.06,29.22) 8(-5.6,29.22) 9(-8.14,29.22) 10(-10.68,29.22) 11(-13.22,29.22) 12(-15.76,29.22) 13(-18.3,29.22) 14(-20.84,29.22) 15(-23.38,29.22) 16(-25.92,29.22) 17(12.18,31.76) 18(9.64,31.76) 19(7.1,31.76) 20(4.56,31.76) 21(2.02,31.76) 22(-0.52,31.76) 23(-3.06,31.76) 24(-5.6,31.76) 25(-8.14,31.76) 26(-10.68,31.76) 27(-13.22,31.76) 28(-15.76,31.76) 29(-18.3,31.76) 30(-20.84,31.76) 31(-23.38,31.76) 32(-25.92,31.76) 33(-28.46,-29.22) 34(-25.92,-29.22) 35(-23.38,-29.22) 36(-20.84,-29.22) 37(-18.3,-29.22) 38(-15.76,-29.22) 39(-13.22,-29.22) 40(-10.68,-29.22) 41(-8.14,-29.22) 42(-5.6,-29.22) 43(-3.06,-29.22) 44(-0.52,-29.22) 45(2.02,-29.22) 46(4.56,-29.22) 47(7.1,-29.22) 48(9.64,-29.22) 49(-28.46,-26.68) 50(-25.92,-26.68) 51(-23.38,-26.68) 52(-20.84,-26.68) 53(-18.3,-26.68) 54(-15.76,-26.68) 55(-13.22,-26.68) 56(-10.68,-26.68) 57(-8.14,-26.68) 58(-5.6,-26.68) 59(-3.06,-26.68) 60(-0.52,-26.68) 61(2.02,-26.68) 62(4.56,-26.68) 63(7.1,-26.68) 64(9.64,-26.68) +5V(45.2,-15.24) +5V(47.74,-15.24) +5V_VCCF(45.2,20.32) +5V_VCCS(47.74,20.32) +5V_VDDF(45.2,17.78) +5V_VDDS(47.74,17.78) +12V(45.2,-12.7) +12V(47.74,-12.7) -12V(45.2,-17.78) -12V(47.74,-17.78) GND(-28.46,29.22) GND(-28.46,31.76) GND(45.2,-10.16) GND(45.2,15.24) GND(47.74,-10.16) GND(47.74,15.24) IN-OUT1(47.74,10.16) IN-OUT2(47.74,7.62) IN-OUT3(47.74,5.08) IN-OUT4(47.74,2.54) IN-OUT5(47.74,0) IN-OUT6(47.74,-2.54) IN-OUT7(47.74,-5.08) IN-OUT8(47.74,-7.62) NC(45.2,12.7) NC(47.74,12.7) OUT1(45.2,10.16) OUT2(45.2,7.62) OUT3(45.2,5.08) OUT4(45.2,2.54) OUT5(45.2,0) OUT6(45.2,-2.54) OUT7(45.2,-5.08) OUT8(45.2,-7.62) VDDS(12.18,-29.22) VEES(47.74,22.86)
  silkscreen extent -29.8,-30.51 49.02,32.97, body extent -29.79,-30.4 48.98,32.92, height 3
PLS2-2,54 [mm]
  rect 1.8x1.8 hole 1: 1(-1.27,0)
  round 1.8 hole 1: 2(1.27,0)
  silkscreen extent -2.5,-1.3 2.5,1.2, body extent -2.54,-1.3 2.54,1.24, height 8.54
PLS3-2,54 [mm]
  rect 1.8x1.8 hole 1: 1(-2.54,0)
  round 1.8 hole 1: 2(0,0) 3(2.54,0)
  silkscreen extent -3.81,-1.27 3.81,1.27, body extent -3.81,-1.27 3.81,1.27, height 8.54
SOD80C [mm]
  rrect50% 1.1x1.7 smd: 1(-1.9,0)
  rect 1.1x1.7 smd: 2(1.9,0)
  silkscreen extent 0.98,-0.8 0.98,0.8, body extent -1.9,-0.8 1.8,0.8, height 1.55
SOIC-8(R-8) [mm]
  oval 1.7x0.65 smd: 1(-2.8,1.905)
  rect 1.7x0.65 smd: 2(-2.8,0.635) 3(-2.8,-0.635) 4(-2.8,-1.905) 5(2.8,-1.905) 6(2.8,-0.635) 7(2.8,0.635) 8(2.8,1.905)
  silkscreen extent -1.62,-2.5 1.62,2.5
SOT-23 [mm]
  rect 0.8x0.9 smd: 1(-0.95,-1) 1(-0.95,-1) 2(0.95,-1) 2(0.95,-1) 3(0,1) 3(0,1)
  silkscreen extent -1.55,-0.72 1.55,0.7, body extent -1.5,-1.25 1.5,1.25, height 1.05
V23079A1001B301 [mm]
  rect 1.4x1.4 hole 0.8: 1(-6.3,-2.54)
  round 1.4 hole 0.8: 3(-1.22,-2.54) 4(1.32,-2.54) 5(3.86,-2.54) 8(3.86,2.54) 9(1.32,2.54) 10(-1.22,2.54) 12(-6.3,2.54)
  silkscreen extent -7.4,-3.63 7.25,3.63, body extent -7.25,-3.6 7.25,3.6, height 9.4

## Part data
C1 C2 C3 C4 C5 C6 C7 C8 C9 C10 C11 C12 C14 C15 C16 C17 C18: library part C0805, ComponentHeigt=1.3, Firme=AVX, KIND=Конденсатор, Leadform=SMD, Packaging=0805
C13: library part C1210, ComponentHeigt=1.3, Firme=AVX, KIND=Конденсатор, Leadform=SMD, Packaging=0805
D1: library part OpAmpType3
R1 R2 R3 R4 R5 R6 R7 R8 R10 R11 R12 R13 R14 R16 R17 R18 R20 R21 R22 R23 R24 R26 R27 R28 R29 R30 R31 R32 R33 R34 R35 R36 R38 R39 R41 R42 R44 R45 R47 R48 R50 R51 R53 R54 R56 R57 R59 R60 R62 R63 R65 R66 R68 R69 R71 R72 R74 R75 R77 R78 R79 R80 R81 R82 R83: library part "R0805 Yageo", ComponentHeigt=0.6, Firme=Yageo, KIND=Резистор, Leadform=SMD, Packaging=0805
R9 R15 R25: library part "R1206 Yageo", ComponentHeigt=0.6, Firme=Yageo, KIND=Резистор, Leadform=SMD, Packaging=0805
R19: library part "R0805 Yageo", "По схеме AD 220k, по схеме Formula 10k", ComponentHeigt=0.6, Firme=Yageo, KIND=Резистор, Leadform=SMD, Packaging=0805
R37 R40 R43 R46 R49 R52 R55 R58 R61 R64 R67 R70 R73: library part "R0603 Yageo", ComponentHeigt=0.5, Firme=Yageo, KIND=Резистор, Leadform=SMD, Packaging=0402
VD2 VD4 VD6 VD8 VD10 VD12 VD14 VD16 VD18 VD20 VD22 VD24 VD26: library part LED(0805), ComponentHeigt=0.75, Firme=Kingbright, KIND="Светодиод L-1154GD Kingbright", Leadform="в отверстия", NN=24003000
VD1 VD3 VD5 VD7 VD9 VD11 VD13 VD15 VD17 VD19 VD21 VD23 VD25 VD27: Component Link=http://www.nxp.com, ComponentHeigt=1.6, Firme=NXP, KIND="Диод LL4148 NXP", Leadform=SMD, NN=24009301, Packaging=SOD-80C
VT1 VT2 VT3 VT4 VT5 VT6 VT7 VT8 VT9 VT10 VT11 VT12 VT13 VT14: ComponentHeigt=1.1, Firme=ONS, KIND="Транзистор MMBT5551L*G ONS", Leadform=SMD, NN=24007468, Packaging=SOT-23
X7 X8 X9: ComponentHeigt=5.5, Name=Вилка, Specification="Вилка PLD2-2 *", Typ=PLD2-2

## Via types
v1: diameter 0.6, hole 0.3, Top Layer to Bottom Layer, tented both sides, 196 vias

## Nets (pads, with @x,y where several pads share a name; then routed paths per layer and width w, separated by ;. In a path a pad name is that pad's centre, name@x,y a point inside that pad or via, vN(x,y) a via of type N, cw(c..) or ccw(c..) an arc to the next point about the centre after c; other vN are vias at no path point)
+5V_CONST: K1.1 K2.1 K3.1 K4.1 K5.1 K6.1 K7.1 K8.1 K9.1 K10.1 K11.1 K12.1 K13.1 K14.1 VD1.2 VD3.2 VD5.2 VD7.2 VD9.2 VD11.2 VD13.2 VD15.2 VD17.2 VD19.2 VD21.2 VD23.2 VD25.2 VD27.2 X1.+5V | length 364.2
  +5V w0.7: K7.1@18.903,29.232 20.756,31.085 ccw(c18.356,33.484) 21.75,33.484 21.75,38.887 ; K12.1@18.939,38.887 21.75,38.887 ; K3.1@36.343,19.238 33.494,22.087 cw(c35.29,23.883) 32.75,23.883 32.75,29 ; K8.1@36.7,28.96 32.847,28.96 cw(c32.847,29.097) 32.75,29 ; K9.1@54.7,28.96 54.695,28.955 cw(c54.2,29.45) 54.2,28.75 53.213,28.75 ; K4.1@54.72,19.34 53.418,20.642 53.417,20.643 cw(c53.913,21.137) 53.213,21.137 53.213,28.75 ; K2.1@54.776,48.57 57.367,48.57 ; K1.1@72.383,39.128 K1.1@72.649,38.862 69.112,38.862 ccw(c69.112,38.75) 69,38.75 ; K6.1@72.41,19.34 69.205,22.545 69.204,22.546 cw(c69.7,23.04) 69,23.04 69,29 ; K10.1@72.45,28.96 69.04,28.96 cw(c69.04,29) 69,29 ; K11.1@113.55,49.79 117.21,49.79 117.25,49.75 ; K14.1@113.55,58.29 113.55,61.2 113.5,61.25 ; K13.1@113.56,14.667 115.877,14.667 ccw(c115.877,15.367) 116.372,14.872 117.25,15.75 117.25,17.399 ; X1.+5V@126.099,17.399 X1.+5V@123.559,17.399 117.25,17.399 ; 21.75,38.887 21.75,51.5 28.006,57.756 cw(c29.802,55.96) 29.802,58.5 32.75,58.5 ; 32.75,29 32.75,58.5 ; 32.75,58.5 57.367,58.5 ; 53.213,28.75 53.213,36.933 cw(c53.913,36.933) 53.417,37.427 55.05,39.06 55.09,39.06 57.367,41.337 57.367,48.57 ; 57.367,48.57 57.367,58.5 ; 57.367,58.5 69,58.5 ; 69,29 69,38.75 ; 69,38.75 69,58.5 ; 69,58.5 91.948,58.5 ccw(c91.948,61.04) 93.744,59.244 95.006,60.506 cw(c96.802,58.71) 96.802,61.25 113.5,61.25 ; 113.5,61.25 114.96,61.25 cw(c114.96,60.55) 115.453,61.047 117.046,59.454 cw(c116.55,58.96) 117.25,58.962 117.25,58.96 117.25,49.75 ; 117.25,17.399 117.25,49.75
  Bottom Layer w0.7: VD13.2@16.567,29.999 16.867,29.999 17.067,29.799 17.067,29.642 17.477,29.232 K7.1@18.903,29.232 ; VD23.2@16.603,39.4 16.803,39.2 18.626,39.2 K12.1@18.939,38.887 ; VD5.2@34.007,20.005 34.248,19.805 34.248,19.649 ccw(c34.679,20.2) 34.677,19.5 35.794,19.5 cw(c35.794,18.8) 36.251,19.33 K3.1@36.343,19.238 ; VD15.2@34.492,29.563 34.692,29.363 34.992,29.363 35.208,29.147 36.513,29.147 K8.1@36.7,28.96 ; VD3.2@52.313,48.956 52.513,48.756 53.217,48.756 53.223,48.75 54.596,48.75 K2.1@54.776,48.57 ; VD9.2@52.317,38.977 54.433,38.977 K5.1@54.7,38.71 ; VD7.2@52.384,19.98 52.684,19.98 52.884,19.78 52.884,19.75 53.294,19.34 K4.1@54.72,19.34 ; VD17.2@52.408,29.6 52.708,29.6 52.908,29.4 52.908,29.37 53.318,28.96 K9.1@54.7,28.96 ; VD11.2@70.201,19.853 70.401,19.653 72.097,19.653 K6.1@72.41,19.34 ; VD19.2@70.25,29.6 70.45,29.4 70.75,29.4 70.995,29.155 72.255,29.155 K10.1@72.45,28.96 ; VD1.2@70.313,39.502 70.613,39.502 70.813,39.302 70.813,39.272 71.223,38.862 K1.1@72.649,38.862 ; K13.1@113.55,14.66 113.75,14.46 ccw(c114.107,15.062) 114.105,14.362 115.36,14.362 cw(c115.36,13.662) 115.492,14.349 115.82,14.287 ccw(c115.952,14.974) 115.948,14.274 VD25.2@116,14.274 ; K11.1@113.55,49.79 113.84,49.5 115.1,49.5 115.5,49.1 115.8,49.1 VD21.2@116,48.9 ; K14.1@113.55,58.29 115.09,58.29 115.5,57.88 115.5,57.6 115.7,57.4 VD27.2@116,57.4
+12V: R2.2 X1.+12V X8.3 | length 69.6
  Bottom Layer w0.7: X8.3@107.451,64.125 109.654,66.328 121.422,66.328 128,59.75 128,21.84 X1.+12V@126.099,19.939 X1.+12V@123.559,19.939 123.553,19.945 121.255,19.945 R2.2@121.25,19.95
-12V: R4.2 X1.-12V X8.1 | length 81.5
  Bottom Layer w0.7: X8.1@103.251,64.125 106.354,67.228 121.795,67.228 128.9,60.123 128.9,17.66 X1.-12V@126.099,14.859 X1.-12V@123.559,14.859 ; R4.2@121.25,14.95 123.468,14.95 X1.-12V@123.559,14.859 ; X1.-12V@123.261,14.859 X1.-12V@123.559,14.859
AC_IN: C10.2 K12.5 | length 2.6
  Bottom Layer w0.2: K12.5@29.099,38.887 31.197,38.887 cw(c31.197,38.572) C10.2@31.512,38.572
AMP+: K11.3 K14.5 X5.1 X11.1 | length 47.8
  Top Layer w0.7: X5.1@92.5,52.062 92.852,52.062 92.959,51.955 92.96,51.954 ccw(c93.454,52.45) 93.454,51.75 106.51,51.75 cw(c106.51,49.79) K11.3@108.47,49.79
  Bottom Layer w0.7: X11.1@81.54,52.25 92.312,52.25 cw(c92.312,52.062) X5.1@92.5,52.062 92.5,57.96 cw(c95.04,57.96) 95.04,60.5 101.18,60.5 cw(c101.18,58.29) K14.5@103.39,58.29
AMP-: K11.10 K14.8 X5.2 X11.2 | length 59.2
  Top Layer w0.7: X5.2@96,55.562 X5.2@89,55.562 X5.2@89,48.562 X5.2@96,48.562 ccw(c98.312,48.562) 98.312,46.25 106.93,46.25 cw(c106.93,44.71) K11.10@108.47,44.71
  Bottom Layer w0.7: X11.2@79,52.25 79,53.022 cw(c81.54,53.022) 81.54,55.562 X5.2@89,55.562 ; X5.2@96,55.562 96,54.04 ccw(c98.54,54.04) 98.54,51.5 101.68,51.5 ccw(c101.68,53.21) K14.8@103.39,53.21
AUX_IN+: D3.3 R9.2 | length 2.3
  Bottom Layer w0.5: D3.3@66.8,10.365 66.858,10.423 68.973,10.423 R9.2@69.05,10.5
AUX_IN-: C11.1 D3.2 R15.2 R19.2 | length 9.6
  Bottom Layer w0.25: D3.2@66.8,11.635 66.975,11.81 67.56,11.81 68.91,13.16 68.91,13.88 R15.2@69.28,14.25 68.68,14.85 68.68,15.074 68.504,15.25 68.5,15.25 67.95,15.8 C11.1@67.95,17.25 R19.2@70.05,17.25
AUX_OUT: C16.1 D3.1 K4.4 K13.10 R16.2 R34.1 X1.51 | length 85.2
  +5V w0.5: X1.51@54.979,5.959 62.34,13.32 K4.4@62.34,19.34
  Rele w0.3: K4.4@62.34,19.34 62.34,13.41 68.5,7.25 94.179,7.25 95.901,5.528 v1@108.701,5.528
  Bottom Layer w0.5: K4.4@62.34,19.34 62.32,19.32 62.32,17.27 R16.2@62.3,17.25 62.4,17.15 62.4,15.85 65.296,12.954 66.12,12.954 66.14,12.934 D3.1@66.771,12.934 ; K13.10@108.47,9.58 cw(c108.47,9.5) 108.55,9.5 R34.1@108.55,7.5 v1(108.55,5.5)
AUX_VCC: C2.1 C3.1 C17.1 D2.8 D3.8 R2.1 | length 79.4
  Signals w0.5: v1(56.5,9.95) 56.5,10.344 cw(c57,10.343) 56.645,10.695 61.2,15.25 81.25,15.25 89.55,23.55 v1(121.25,23.55)
  Bottom Layer w0.5: D2.8@53.4,9.77 53.325,9.845 D2.8@52.8,9.845 52.853,9.898 C17.1@56.448,9.898 ; C17.1@56.25,9.7 C17.1@56.448,9.898 ; v1(56.5,9.95) C17.1@56.448,9.898 ; C3.1@60.8,14.75 60.8,12.98 60.875,12.905 D3.8@61.2,12.905 ; R2.1@121.25,21.7 v1(121.25,23.55)
  other v1: 60.7,14.75
AUX_VEE: C5.1 C6.1 C18.1 D2.4 D3.4 R4.1 | length 98
  Signals w0.5: v1(47.3,15.25) 53.55,9 53.561,9 54,8.561 54,8.55 54.3,8.25 v1(69.05,8.25) 69.05,9.594 cw(c69.55,9.593) 69.195,9.945 72.354,13.104 cw(c72.707,12.75) 72.707,13.25 80.033,13.25 ccw(c80.033,13.75) 80.386,13.396 89.84,22.85 113.906,22.85 116.317,22.85 121.25,17.917 v1(121.25,11.2)
  Bottom Layer w0.5: D2.4@47.2,13.655 C18.1@47.2,15.2 ; D3.4@67.325,9.095 67.4,9.02 67.693,9.02 68.28,9.02 68.65,8.65 68.7,8.65 69.05,8.3 v1(69.05,8.25)
  Bottom Layer w0.7: v1(121.25,11.2) R4.1@121.25,13.05
DOP: D1.6 X1.38 | length 71.7
  +5V w0.5: X1.38@62.599,3.419 64.122,1.896 64.123,1.895 ccw(c64.475,2.25) 64.475,1.75 94.043,1.75 ccw(c94.043,2.25) 94.396,1.896 98.604,6.104 ccw(c98.25,6.457) 98.75,6.457 98.75,19.043 ccw(c98.25,19.043) 98.604,19.396 93.75,24.25 93.75,30.64 D1.6@98.42,35.31
DUT_OUT: D1.8 K1.3 K1.8 K2.3 K5.4 K12.8 | length 91.7
  Top Layer w0.5: K12.8@29.099,43.967 32.066,41 58,41 ; K2.3@59.856,48.57 58,46.714 58,41 ; K5.4@62.32,38.71 62.32,41 ; K1.3@77.729,38.862 77.729,40.979 ; K1.3@77.732,38.862 ccw(c77.282,38.859) K1.3@77.732,38.882 ; K1.8@82.809,43.942 82.809,42.266 cw(c82.309,42.266) 82.664,41.914 81.896,41.146 cw(c81.543,41.5) 81.543,41 77.729,41 62.32,41 ; 58,41 62.32,41
  Signals w0.5: K1.8@82.809,43.942 91.5,35.251 91.5,32.07 D1.8@95.88,27.69
DUT_VCC: C1.1 K11.4 R1.2 | length 15.9
  Bottom Layer w0.7: K11.4@105.93,49.79 107.44,51.3 117.75,51.3 C1.1@119.25,51.3
  Bottom Layer w1: C1.1@119.25,51.3 R1.2@121.25,51.3
DUT_VCC_EXT: R1.1 X1.+5V_VCCF X1.+5V_VCCS X7.3 | length 23.8
  Top Layer w0.7: X7.3@118.627,64.125 123.625,64.125 127.545,60.205 cw(c127.05,59.71) 127.75,59.71 127.75,54.9 cw(c127.05,54.9) 127.545,54.405 X1.+5V_VCCS@126.099,52.959 X1.+5V_VCCF@123.559,52.959
  Bottom Layer w0.7: R1.1@121.37,53.079 R1.1@121.25,53.2 ccw(c121.491,53.2) 121.491,52.959 X1.+5V_VCCF@123.559,52.959 ; X1.+5V_VCCS@125.979,53.079 X1.+5V_VCCS@126.099,52.959
DUT_VEE: C4.1 K14.4 R3.1 SA4.1 | length 73.7
  Top Layer w0.7: K14.4@105.93,58.29 ccw(c108.22,58.29) 107.249,56.216 107.253,56.214 ccw(c107.546,56.85) 107.543,56.15 114.849,56.15 cw(c114.852,50.752) 120.25,50.774 cw(c115.002,50.752) 120.25,50.767 120.25,50.762 120.25,25.79 cw(c119.55,25.79) 120.047,25.297 114.704,19.954 cw(c114.21,20.45) 114.21,19.75 SA4.1@110.29,19.75
  Bottom Layer w0.7: K14.4@105.93,58.29 107.89,60.25 115.9,60.25 119.2,56.95 C4.1@119.25,56.95 R3.1@121.25,56.95
DUT_VEE_EXT: R3.2 X1.VEEF X1.VEES X7.1 | length 17.7
  Top Layer w0.7: X7.1@114.427,64.125 114.833,64.125 122.909,56.049 123.009,56.049 X1.VEEF@123.559,55.499 X1.VEES@126.099,55.499
  Bottom Layer w0.7: R3.2@121.25,55.05 121.474,55.274 123.335,55.274 X1.VEEF@123.559,55.499
DUT_VO: C7.1 C8.1 R5.1 X10.3 | length 75.8
  Bottom Layer w0.5: X10.3@76.46,11.443 76.46,9 C8.1@76.45,9 83.25,9 86.5,12.25 86.5,20.75 97.25,31.5 116.25,31.5 119.25,34.5 C7.1@119.25,47.55 R5.1@121.25,47.55
DUT_VO_EXT: R5.2 X1.+5V_VDDF X1.+5V_VDDS X9.1 | length 52.7
  Top Layer w0.7: X9.1@96.139,64.125 99.014,67 122.023,67 128.545,60.478 cw(c128.05,59.983) 128.75,59.983 128.75,53.36 cw(c128.05,53.36) 128.545,52.865 X1.+5V_VDDS@126.099,50.419 X1.+5V_VDDF@123.559,50.419
  Bottom Layer w0.7: R5.2@121.25,49.45 122.59,49.45 X1.+5V_VDDF@123.559,50.419
GEN: K12.4 X2.1 X4.1 | length 46.8
  Top Layer w0.5: X2.1@9.38,12.839 X4.1@9.38,35.589 9.38,39.38 cw(c11.75,39.38) 11.75,41.75 24.019,41.75 cw(c24.019,39.21) 26.559,39.21 K12.4@26.559,38.887
GND: C1.2 C2.2 C3.2 C4.2 C5.2 C6.2 C7.2 C8.2 C12.2 C13.2 C14.2 C15.2 C17.2 C18.2 D1.4 D1.11 D2.5 D3.5 K6.5 K7.3 R10.2 R17.1 R18.2 R36.2 R39.2 R42.2 R45.2 R48.2 R51.2 R54.2 R57.2 R60.2 R63.2 R66.2 R69.2 R72.2 R75.2 SA4.3 SA7.3 VD2.2 VD4.2 VD6.2 VD8.2 VD10.2 VD12.2 VD14.2 VD16.2 VD18.2 VD20.2 VD22.2 VD24.2 VD26.2 VT1.2 VT2.2 VT3.2 VT4.2 VT5.2 VT6.2 VT7.2 VT8.2 VT9.2 VT10.2 VT11.2 VT12.2 VT13.2 VT14.2 X1.GND X2.2 X3.2 X4.2 X6.2 X7.2 X7.4 X8.2 X8.4 X9.2 X10.1 | length 1.6
  Bottom Layer w0.2: D3.5@61.845,9.215 61.845,9.095 D3.5@61.2,9.095 61.696,9.095 D3.5@61.921,8.87
  Bottom Layer w0.3: VT4.2@58.337,20.93 VT4.2@58.361,20.906
  other v1: 61,1.5 28.75,2 38.25,2 42,2 96.25,2 104.25,2 109.75,2 112.5,3.25 116.5,3.25 93.75,3.5 101,4.5 104.25,4.5 116.5,6 40.25,8.25 70.95,8.25 116.5,8.75 85.25,9 111.064,9.345 118.75,9.75 40.25,10.25 123.75,11.75 127.25,11.75 118.75,13 84.5,13.25 58.8,14.75 111,14.75 84.5,15.25 44.5,15.4 118.75,16 80.5,16.75 74.5,17 100,17 30.75,17.25 57,17.5 105.5,17.5 112,17.5 114.5,17.5 52.5,18.25 118.25,18.75 57,19 67.288,19.107 38.75,19.25 90,20 94.25,20 100,20.25 30.75,21 42.5,21.5 45.5,21.5 101,21.5 61.25,22 65,22 119.5,22 23.5,23.75 13,24 39,24.25 56.75,24.5 75,24.5 30.75,24.75 108,25.5 112.25,25.5 70.5,25.75 34,26.5 89.25,27.25 115,28 57,28.75 87.25,28.75 91,28.75 118.25,28.75 121.5,28.75 21.5,29 39.25,34 57.25,34.25 75.5,34.25 115.25,34.75 89,35 93.5,35.25 34.5,36 72.5,36.25 16.25,36.75 57.25,38.5 75.25,38.75 50,39.25 39,39.5 28.25,41 29.75,41 115.75,42.5 91.75,42.75 97.75,42.75 38,43.75 50,43.75 75.25,44 121.5,44.25 111,44.5 67.75,46.5 70.25,46.5 50,46.75 38,47 105.5,47.5 107.75,47.5 81.25,47.75 99,48 19.75,49.75 24,49.75 29.75,49.75 35.5,49.75 50,49.75 110.75,49.75 84.75,50 61.25,50.75 110.75,53.25 71.75,54.25 74.25,54.25 99,55 19.75,55.5 76.5,55.75 102.75,56.25 104.75,56.25 64,57.25 67.75,57.25 76.5,57.25 81,57.25 85.5,57.25 94.75,58.25 98,58.25 110.871,58.296 124.25,59 19.75,59.75 34.25,59.75 44.25,59.75 57.25,59.75 70.25,59.75 80.25,59.75 90.25,59.75 122.75,60.75 128.5,63.5 126.75,65.25 123,69
IN+: D1.10 K10.4 R23.1 | length 28.8
  Top Layer w0.2: K10.4@80.07,28.96 cw(c82.36,28.96) 82.36,31.25 97.4,31.25 cw(c97.4,27.467) D1.10@101.183,27.467
  Bottom Layer w0.2: K10.4@80.07,28.96 80.3,28.73 81.02,28.73 83.2,26.55 R23.1@83.2,26.5
IN-: D1.5 K1.9 K10.9 R6.2 R7.2 R14.1 | length 68.5
  Top Layer w0.2: K1.9@80.269,43.942 80.269,43.96 cw(c82.809,43.96) 82.809,46.5 84.048,46.5 cw(c84.048,43.298) 87.25,43.298 87.25,38.29 cw(c85.46,38.29) 85.46,36.5 82.53,36.5 ccw(c82.53,34.04) K10.9@80.07,34.04 ccw(c82.11,34.04) 82.11,32 97.65,32 ccw(c97.65,35.31) D1.5@100.96,35.31
  Signals w0.2: v1(70.95,48.25) 77.729,48.25 cw(c77.729,45.71) 80.269,45.71 K1.9@80.269,43.942
  Bottom Layer w0.2: K10.9@80.07,34.04 81.28,35.25 81.95,35.25 84.745,38.045 84.745,38.247 v1(85.172,38.674)
INPUT+: K7.4 K8.5 K9.5 K10.5 R20.2 R81.2 X1.49 | length 90.7
  +5V w0.2: K8.5@46.86,28.96 46.97,29.07 48.223,29.07 cw(c48.223,28.57) 48.575,28.925 49.753,27.747 cw(c49.399,27.394) 49.899,27.394 X1.49@49.899,5.959
  Signals w0.2: K7.4@26.523,29.232 cw(c27.881,29.232) 27.881,30.59 46.86,30.59 ; K8.5@46.86,28.96 46.86,30.59 ; K9.5@64.86,28.96 64.86,30.59 ; K10.5@82.61,28.96 82.61,29.39 ccw(c81.41,29.39) 81.41,30.59 64.86,30.59 ; 46.86,30.59 64.86,30.59
  Bottom Layer w0.2: K8.5@46.86,28.96 46.86,27.09 v1(47.2,26.75) R81.2@49.05,26.75
INPUT-: K8.8 K9.8 K10.8 R8.1 R10.1 R11.2 X1.50 | length 89.1
  +5V w0.2: K8.8@46.861,34.039 50.692,30.208 cw(c50.55,30.067) 50.75,30.068 ; 50.75,30.067 50.75,7.648 X1.50@52.439,5.959
  Signals w0.2: K8.8@46.86,34.04 ccw(c48.47,34.04) 48.47,32.43 64.86,32.43 ; K9.8@64.86,34.04 64.86,32.43 ; K10.8@82.61,34.04 82.61,33.59 cw(c81.45,33.59) 81.45,32.43 64.86,32.43
  Bottom Layer w0.2: R8.1@33.5,38.55 35.3,38.55 ccw(c35.3,38.572) R10.1@35.322,38.572 47.056,38.572 48.271,37.357 48.271,36.429 R11.2@48.45,36.25 48.1,35.9 48.1,35.28 K8.8@46.86,34.04
LOAD: R24.2 R28.2 R29.2 R30.2 R31.2 SA7.2 | length 13.8
  Bottom Layer w0.7: R24.2@27.75,8.05 R28.2@30.25,8.05 R29.2@32.75,8.05 ; SA7.2@32.75,4.25 R29.2@32.75,8.05 ; R31.2@37.75,8.05 R30.2@35.25,8.05 R29.2@32.75,8.05